# Allegro board PolarFire_SoC_Discovery_Kit_Rev2_PCB_091923.brd
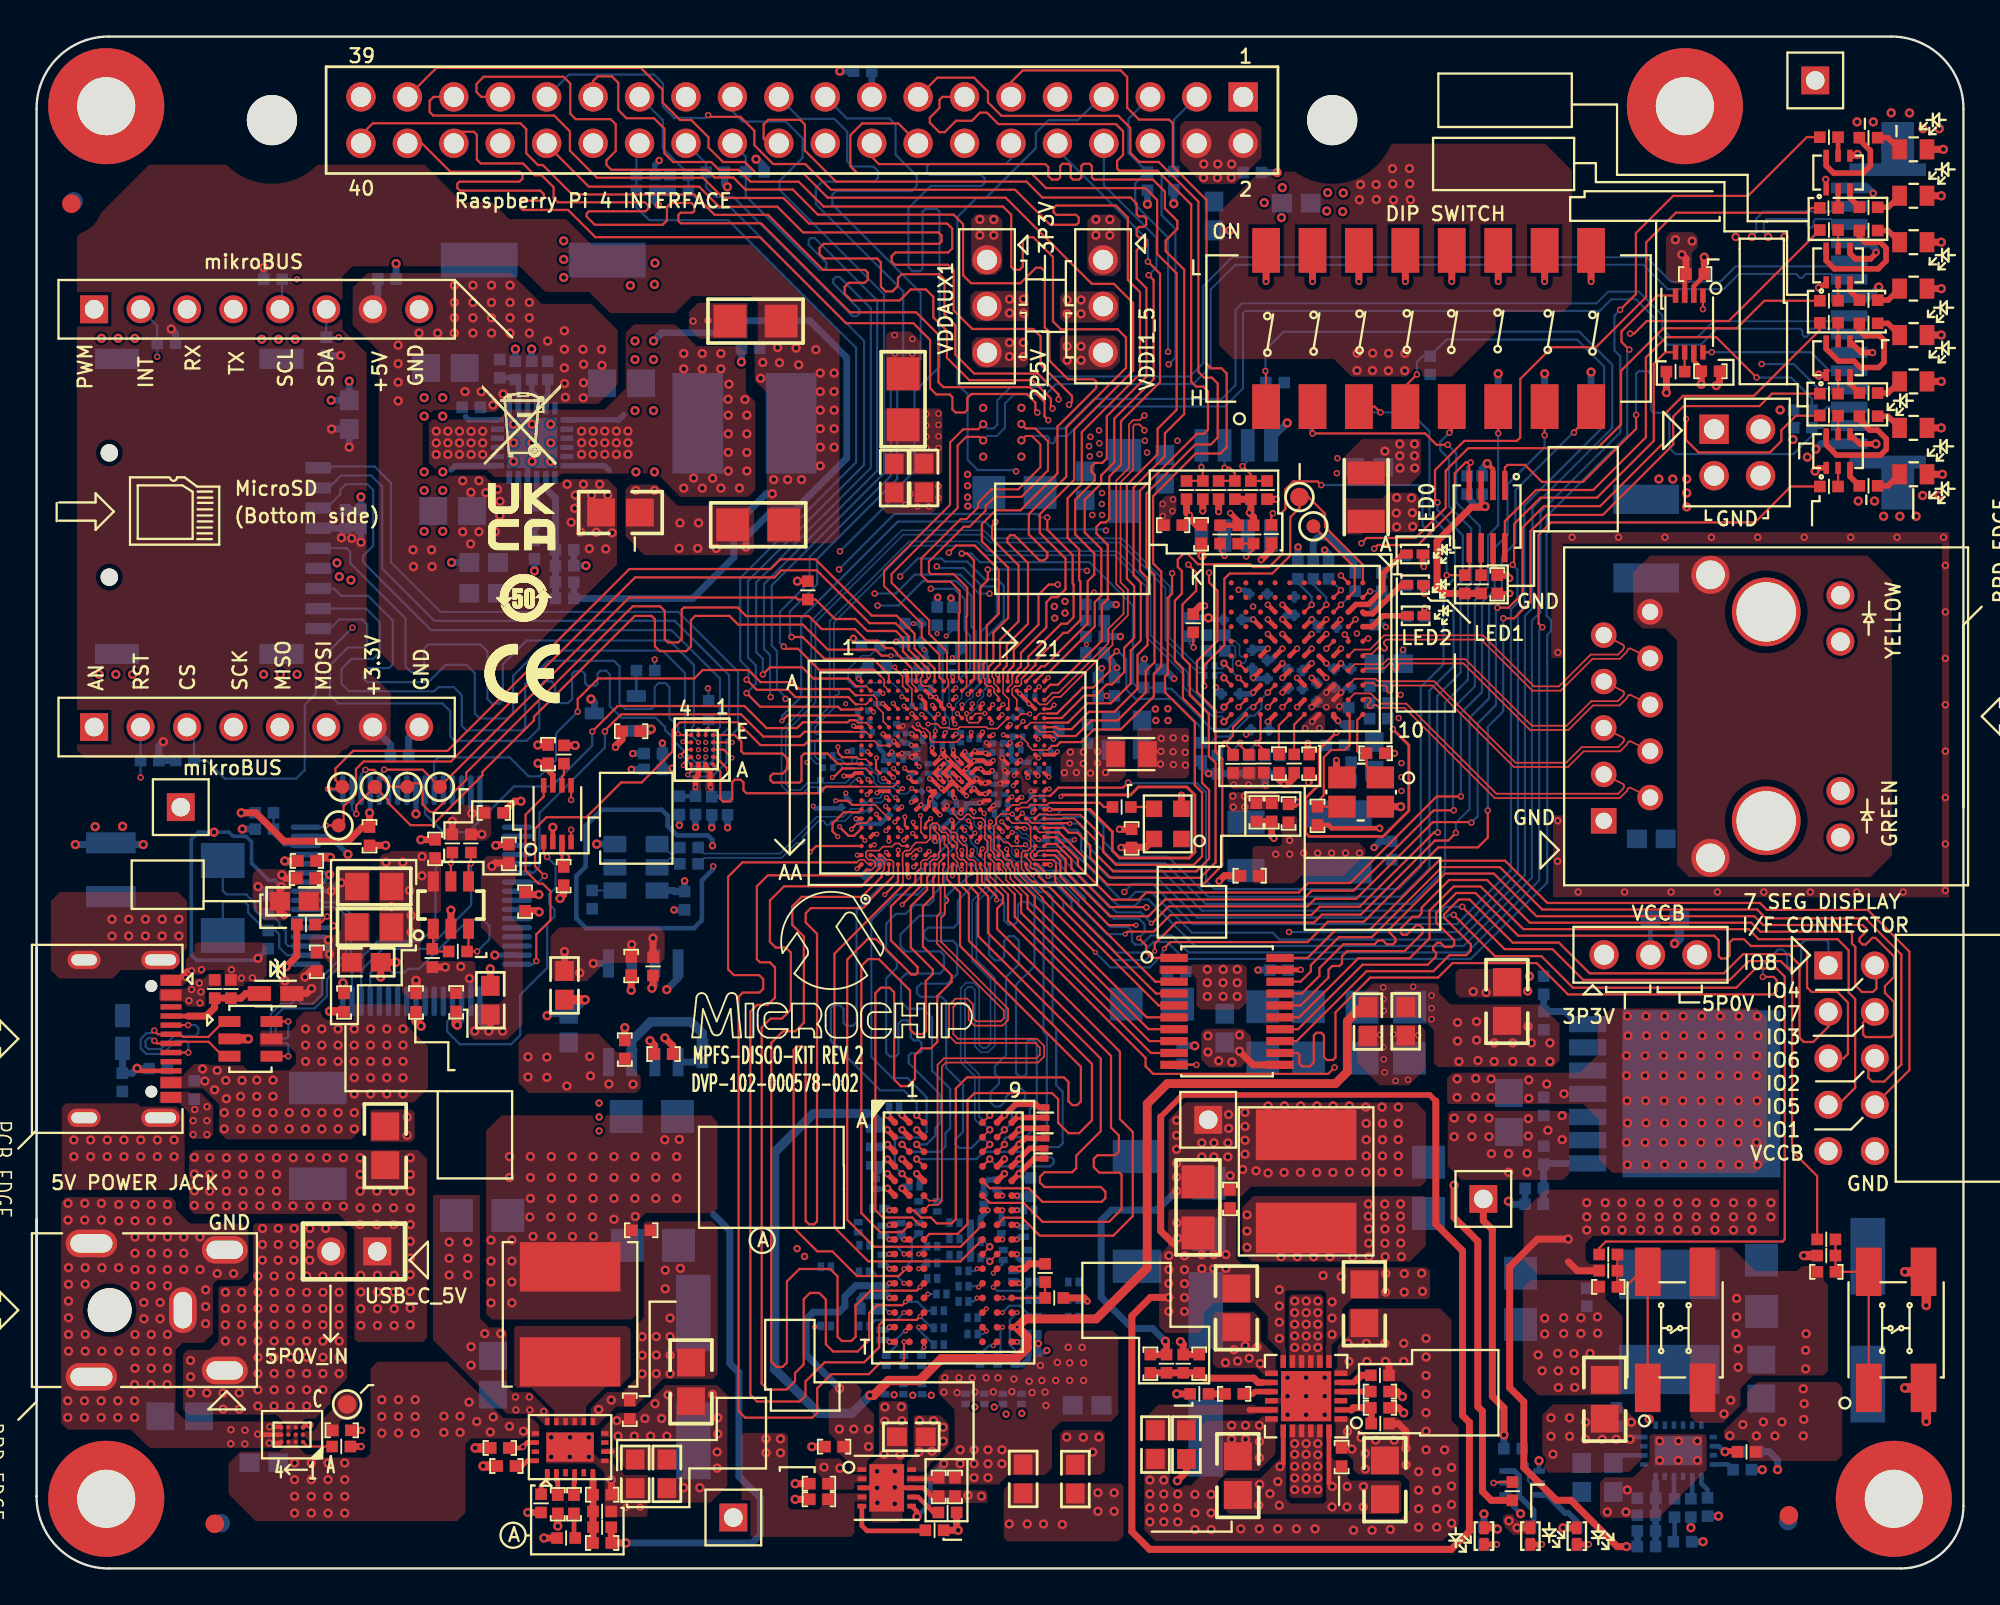
[diagram p0: board, top side]
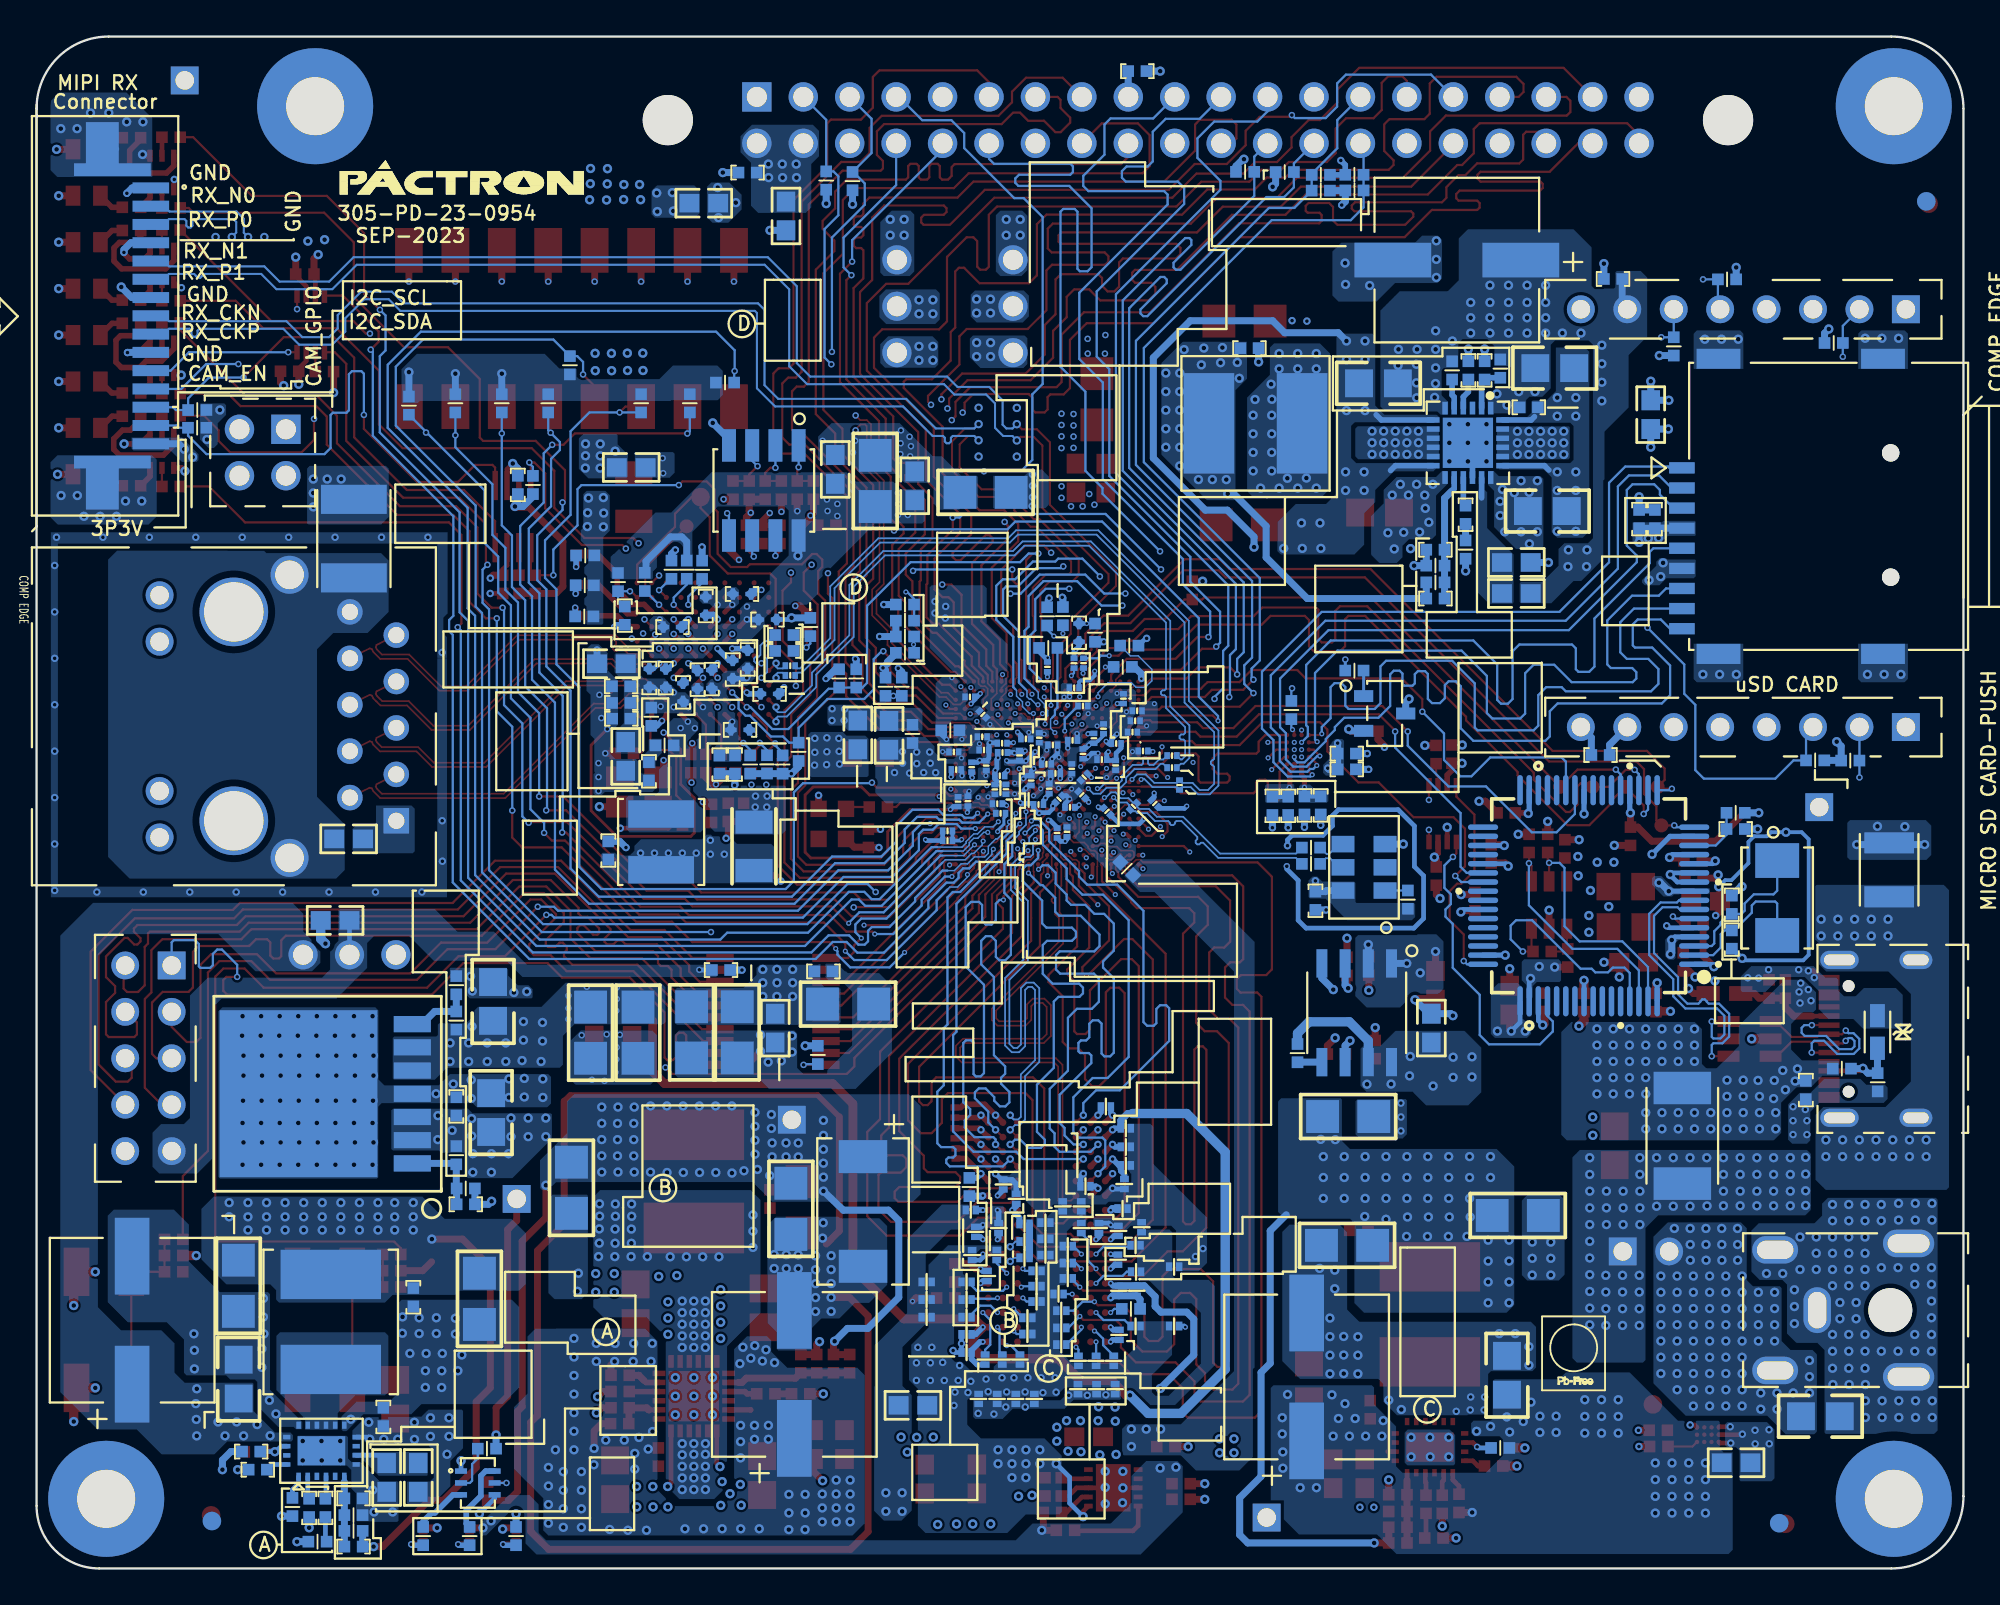
[diagram p1: board, bottom side, seen from below]

Outline 105.41 x 83.82 mm; copper layers: TOP, L02_GND1, L03_SIG1, L04_PWR, L05_GND2, BOTTOM. Coordinates in mm from the lower left corner of the outline.
Outline path: 0,79.88 arc(1.15,82.67) 3.94,83.82 101.47,83.82 arc(104.26,82.67) 105.41,79.88 105.41,3.43 arc(104.41,1) 101.98,0 3.94,0 arc(1.15,1.15) 0,3.94 0,79.88

## Design rules (mm)
net group CAMERA MODULE - SCL&SDA-1: nets CAM_I2C_SCL_B0 CAM_I2C_SDA_B0
net group CAMERA MODULE_SCL_SDA: nets CAM_I2C_SCL CAM_I2C_SDA
net group D3 TO J4(U16 TO D3): nets DM_FT4232H DP_FT4232H
net group DP&DM(D3 TO J4): nets DM_USBC DP_USBC
net group MIKROBUS - SCL&SDA: nets MBUS_I2CSCL MBUS_I2CSDA
net group RPI - SCL&SDA: nets RPI_GPIO2_SDA RPI_GPIO3_SCL
net group SCLKP/N: nets N17719658 N17719679
net group U1 TO J12: nets GPIO52NB1/LPRB_B GPIO52PB1/LPRB_A
net group U1 TO X1(REFCLK)-1: nets OSC_125MHZ_RFCLK_IN_N OSC_125MHZ_RFCLK_IN_P
net group U4 TO U5  -  SCL&SDA: nets VSC_EEP_SCLK VSC_EEP_SDAT
net group 7 SEGMENT DISPLAY DB(U1 TO U6): nets B0_SEG_DSP_IO1 B0_SEG_DSP_IO2 B0_SEG_DSP_IO3 B0_SEG_DSP_IO4 B0_SEG_DSP_IO5 B0_SEG_DSP_IO6 B0_SEG_DSP_IO7 B0_SEG_DSP_IO8
net group 7 SEGMENT DISPLAY DB(U6 TO J48): nets SEG_DSP_IO1 SEG_DSP_IO2 SEG_DSP_IO3 SEG_DSP_IO4 SEG_DSP_IO5 SEG_DSP_IO6 SEG_DSP_IO7 SEG_DSP_IO8
net group CLK_DATA: nets CLK CS DATA
net group DATA1: nets MSS_DDR4_DM0 MSS_DDR4_DQ0 MSS_DDR4_DQ1 MSS_DDR4_DQ2 MSS_DDR4_DQ3 MSS_DDR4_DQ4 MSS_DDR4_DQ5 MSS_DDR4_DQ6 MSS_DDR4_DQ7 MSS_DDR4_DQS_N0 MSS_DDR4_DQS_P0
net group DATA2: nets MSS_DDR4_DM1 MSS_DDR4_DQ8 MSS_DDR4_DQ9 MSS_DDR4_DQ10 MSS_DDR4_DQ11 MSS_DDR4_DQ12 MSS_DDR4_DQ13 MSS_DDR4_DQ14 MSS_DDR4_DQ15 MSS_DDR4_DQS_N1 MSS_DDR4_DQS_P1
net group EXTERNAL SPI FLASH: nets N17907305
net group JTAG(U1/RES TO U16): nets PF_JTAG_TCK PF_JTAG_TDI PF_JTAG_TDO PF_JTAG_TMS
net group MIKROBUS - SPI: nets MBUS_SPI_CLK MBUS_SPI_CS# MBUS_SPI_MISO MBUS_SPI_MOSI
net group POWER: nets EN_VTT N17891139 N17891244 N17891248 N17891304 N17891314 N17891462 N18024972 N18024974 N18024978 N18025016 N18025022 N18025105 N18025111 N18216548 N18216755 N18216781 N18216807 N18216811 N18216900 N18216912 N18219881 N18219893 N21999023 N21999055 N22171752 N22172011 N22172037 N22172059 N22172071 N22172213 PG_VTT
net group RPI 4 DATA&CLK: nets RPI_GPIO7 RPI_GPIO8_SPI_CE0_N RPI_GPIO9_SPI_MISO RPI_GPIO10_SPI_MOSI RPI_GPIO11_SPI_SCLK
net group RPI_GPIO: nets RPI_GPIO5 RPI_GPIO6 RPI_GPIO12 RPI_GPIO13 RPI_GPIO16 RPI_GPIO19 RPI_GPIO20 RPI_GPIO21 RPI_GPIO26
net group RPI_GPIO_GEN: nets RPI_GPIO17_GEN0 RPI_GPIO18_GEN1 RPI_GPIO22_GEN3 RPI_GPIO23_GEN4 RPI_GPIO24_GEN5 RPI_GPIO25_GEN6 RPI_GPIO27_GEN2
net group SDIO INTERFACE(U1 TO U85): nets SD_LT_CLK SD_LT_CMD SD_LT_DATA0 SD_LT_DATA1 SD_LT_DATA2 SD_LT_DATA3
net group SGMII INTERFACE (U4 TO J3): nets TXVNA TXVNB TXVNC TXVND TXVPA TXVPB TXVPC TXVPD
net group VSC1(U1 TO U4): nets VSC_MDC VSC_MDINTB VSC_MDIO
net group VSC(U4 TO J2): nets VSC_TCK VSC_TDI VSC_TDO VSC_TMS
nets with their own width: min track width 0.254; nets GND

## Placement (name value [footprint] x y rotation side)
C1  10uF/10V  [C0603]  57.47 8.92 180 bottom
C2  0.1uF/16V  [C0201]  47.42 9.81 90 bottom
C3  0.1uF/16V  [C0201]  53.87 9.28 90 bottom
C4  0.1uF/16V  [C0201]  50.22 17.14 180 bottom
C5  0.1uF/16V  [C0201]  56.72 14.71 180 bottom
C6  0.1uF/16V  [C0201]  56.72 13.75 180 bottom
C7  0.1uF/16V  [C0201]  52.86 9.28 90 bottom
C8  0.1uF/16V  [C0201]  51.84 9.28 90 bottom
C9  0.1uF/16V  [C0201]  50.83 9.28 90 bottom
C10  0.1uF/16V  [C0201]  46.41 9.81 90 bottom
C11  0.1uF/16V  [C0201]  48.26 19.81 270 bottom
C12  0.1uF/16V  [C0201]  50.22 18.92 180 bottom
C13  0.1uF/16V  [C0201]  43.18 13.26 0 bottom
C14  0.1uF/16V  [C0201]  56.72 15.68 180 bottom
C15  0.1uF/16V  [C0201]  49.28 19.81 270 bottom
C16  0.1uF/16V  [C0201]  43.18 16.51 0 bottom
C17  0.1uF/16V  [C0201]  44.96 18.67 270 bottom
C18  0.1uF/16V  [C0201]  50.22 18.03 180 bottom
C19  0.1uF/16V  [C0201]  48.44 9.81 90 bottom
C20  0.1uF/16V  [C0201]  54.23 17.14 90 bottom
C21  10uF/10V  [C0603]  53.97 4.9 90 top
C22  0.1uF/16V  [C0201]  51.36 18.85 180 bottom
C23  0.1uF/16V  [C0201]  45.24 15.19 270 bottom
C24  0.01uF/16V  [C0201]  46.2 15.19 270 bottom
C25  0.01uF/16V  [C0201]  53.39 16 90 bottom
C26  0.01uF/16V  [C0201]  45.82 23.07 0 bottom
C27  0.01uF/16V  [C0201]  45.9 21.04 90 bottom
C28  0.01uF/16V  [C0201]  46.18 12.78 90 bottom
C29  0.01uF/16V  [C0201]  54.31 19.61 180 bottom
C30  0.01uF/16V  [C0201]  54.05 18.42 270 bottom
C31  0.01uF/16V  [C0201]  48.03 20.91 180 bottom
C32  0.01uF/16V  [C0201]  46.23 18.47 270 bottom
C33  0.01uF/16V  [C0201]  52.53 21.01 270 bottom
C34  0.01uF/16V  [C0201]  55.17 23.81 90 top
C35  0.1uF/16V  [C0201]  46 19.69 0 bottom
C36  0.1uF/16V  [C0201]  45.82 22.05 0 bottom
C37  0.1uF/16V  [C0201]  52.78 18.62 270 bottom
C38  0.1uF/16V  [C0201]  46.91 25.27 180 bottom
C39  0.1uF/16V  [C0201]  55.17 24.95 270 top
C40  0.1uF/16V  [C0201]  47.29 18.62 270 bottom
C41  0.1uF/16V  [C0201]  55.12 22.71 90 top
C42  0.1uF/16V  [C0201]  46.25 16.9 270 bottom
C43  0.1uF/16V  [C0201]  51.82 20.22 270 bottom
C44  0.1uF/16V  [C0201]  54.53 11.82 180 bottom
C45  10uF/10V  [C0603]  61.72 60.14 90 bottom
C46  0.01uF/16V  [C0201]  45.82 24.08 0 bottom
C47  0.1uF/16V  [C0201]  54.53 12.81 180 bottom
C48  0.1uF/25V  [C0402]  28.83 37.88 270 top
C49  0.1uF/25V  [C0402]  27.98 44.56 270 top
C50  1uF/16V  [C0402]  16.7 7.56 0 top
C51  2.2uF/16V  [C0603]  12.44 5.78 180 bottom
C52  1uF/16V  [C0402]  8.62 26.18 90 bottom
C60  0.1uF/16V/10%/X7R  [C0402]  67.97 44.04 90 top
C61  1uF/16V_NL  [C0402]  73.23 52.13 270 bottom
C62  0.01uF/16V  [C0402]  64.51 50.2 180 bottom
C63  0.1uF/25V  [C0402]  63.71 56.59 90 top
C64  0.1uF/25V  [C0402]  59.91 39.95 90 top
C65  33pF/25V  [C0402]  70.07 41.18 270 top
C66  33pF/25V  [C0402]  73.25 44.6 0 top
C67  0.01uF/16V  [C0201_HS]  43.3 43.81 0 bottom
C68  0.01uF/16V  [C0201_HS]  43.3 44.48 0 bottom
C69  0.01uF/16V  [C0201_HS]  64.18 48.86 180 bottom
C70  0.01uF/16V  [C0201_HS]  64.18 49.39 180 bottom
C74  0.1uF/50V  [C0603]  88.34 39.92 0 bottom
C76  1000pF/3KV  [C1812]  88.05 56.35 90 bottom
C77  10uF/6.3V  [C0402]  74.13 39.28 90 bottom
C78  10uF/10V  [C0603]  73.18 44.43 270 bottom
C79  1uF/16V  [C0402]  73.42 46.49 0 bottom
C80  0.01uF/16V  [C0402]  64.51 51.07 180 bottom
C81  1000pF/50V  [C0402]  71.91 43.62 90 bottom
C82  0.1uF/25V  [BGA0402]  70.62 51.51 180 bottom
C83  0.1uF/25V  [BGA0402]  66.51 49.74 270 bottom
C84  0.1uF/25V  [BGA0402]  68.8 52.66 90 bottom
C85  10uF/6.3V  [C0402]  69.62 44.04 270 top
C86  10uF/6.3V  [C0402]  67.2 43.99 270 bottom
C87  10uF/10V  [C0603]  72.88 60.24 180 bottom
C88  0.1uF/25V  [BGA0402]  65.43 51.92 180 bottom
C89  0.1uF/25V  [BGA0402]  66.82 53.32 0 bottom
C90  1uF/16V  [C0402]  68.05 43.99 270 bottom
C91  1uF/16V_NL  [C0402]  68.49 41.31 90 top
C92  1uF/16V  [C0402]  62.18 57.08 0 top
C93  0.1uF/25V  [BGA0402]  67.32 49.19 270 bottom
C94  0.1uF/25V  [BGA0402]  70.05 47.94 90 bottom
C95  0.1uF/25V  [BGA0402]  68.47 48.66 270 bottom
C96  0.1uF/25V  [BGA0402]  66.92 45.89 0 bottom
C97  0.1uF/25V  [BGA0402]  70.99 48.72 90 bottom
C98  0.1uF/25V  [BGA0402]  71.89 48.72 90 bottom
C99  0.1uF/25V  [BGA0402]  69.25 48.63 270 bottom
C100  0.1uF/25V  [C0402]  73.43 48.27 0 bottom
C101  10uF/10V  [C0603]  73.96 49.5 0 bottom
C102  10uF/6.3V  [C0402]  66.73 41.37 270 top
C103  1uF/16V  [C0402]  73.42 47.36 0 bottom
C104  0.1uF/25V  [BGA0402]  65.31 47.85 180 bottom
C105  1uF/16V  [C0402]  67.57 41.37 270 top
C106  1uF/16V  [C0402]  66.36 37.9 180 top
C107  0.1uF/25V  [C0402]  35.45 36.53 270 bottom
C108  4.7nF/25V  [BGA0201]  50.01 42.66 270 bottom
C109  4.7nF/25V  [BGA0201]  50.16 44.01 0 bottom
C110  4.7nF/25V  [BGA0201]  51 43.11 270 bottom
C111  1000pF/16V  [BGA0201]  55.1 43.71 0 bottom
C112  4.7nF/25V  [BGA0201]  49.67 43.5 180 bottom
C113  1000pF/16V  [BGA0201]  53.46 43.93 90 bottom
C114  0.1uF/16V  [BGA0201]  51.29 45.39 0 bottom
C115  0.1uF/16V  [BGA0201]  50.6 41.8 180 bottom
C116  0.1uF/16V  [BGA0201]  47.04 45.94 270 bottom
C117  0.1uF/16V  [BGA0201]  50.56 45.45 270 bottom
C118  0.1uF/16V  [BGA0201]  49.48 42.1 135 bottom
C119  0.1uF/16V  [BGA0201]  48.73 45.31 0 bottom
C120  0.01uF/16V  [BGA0201]  51.64 44.48 90 bottom
C121  0.1uF/16V  [BGA0201]  55.23 44.68 0 bottom
C122  0.1uF/16V  [BGA0201]  54.46 41.98 270 bottom
C123  10uF/10V  [C0603]  48.55 59.67 270 top
C124  0.1uF/16V_NL  [BGA0201]  53.64 46.73 45 bottom
C125  0.1uF/16V_NL  [BGA0201]  48.23 42.33 45 bottom
C126  0.1uF/16V  [BGA0201]  44.24 41.85 225 bottom
C127  0.1uF/16V  [BGA0201]  49.04 40.3 90 bottom
C128  0.1uF/16V  [BGA0201]  48.78 43.75 90 bottom
C129  0.1uF/16V_NL  [BGA0201]  55 41.96 270 bottom
C130  0.1uF/16V_NL  [BGA0201]  49.82 45.06 0 bottom
C131  47uF/10V  [C1206]  53.5 58.88 180 bottom
C133  47uF/6.3V  [C1206]  69.58 29.33 90 bottom
C134  10uF/10V  [C0603]  58.78 45.59 270 bottom
C135  47uF/6.3V  [C1206]  67.08 29.33 90 bottom
C137  0.1uF/16V  [BGA0201]  48.65 48.19 180 bottom
C139  0.1uF/16V  [BGA0201]  50.11 49.33 90 bottom
C140  10uF/10V  [C0603]  60.48 45.61 270 bottom
C141  0.1uF/16V  [BGA0201]  52.99 42.62 270 bottom
C142  0.1uF/16V  [BGA0201]  52.59 45.15 0 bottom
C143  0.1uF/16V_NL  [BGA0201]  54.35 47.69 0 bottom
C144  47uF/6.3V  [C1206]  63.54 19.76 90 top
C145  0.1uF/16V  [BGA0201]  48.88 41.65 0 bottom
C147  0.1uF/16V  [BGA0201]  52.85 41.84 0 bottom
C148  1000pF/16V  [BGA0201]  52.72 43.37 180 bottom
C150  0.1uF/16V  [BGA0201]  47.57 45.42 270 bottom
C152  330uF/6.3V  [TAN_D_TPSD]  60.2 19.53 270 bottom
C153  10uF/10V  [C0603]  72.83 29.92 90 top
C154  0.1uF/16V  [BGA0201]  54.25 43.84 90 bottom
C155  47uF/6.3V  [C1206]  75.1 29.31 90 bottom
C156  47uF/10V  [C1206]  59.53 59.5 270 bottom
C157  0.1uF/16V  [BGA0201]  52.38 42.63 270 bottom
C158  0.1uF/16V  [BGA0201]  52.57 44.65 180 bottom
C159  10uF/10V  [C0603]  74.9 29.94 90 top
C160  470uF/16V  [CAP_AL_D_8P3MM_DUAL_FP_16SEV_865]  63.96 10.62 90 bottom
C161  47uF/10V  [C1206]  64.14 19.67 270 bottom
C162  47uF/10V  [C1206]  76.15 20.83 270 bottom
C165  22uF/16V  [C0805]  73.76 4.85 270 top
C166  22uF/16V  [C0805]  72.64 14.48 90 top
C168  0.1uF/25V  [C0402]  71.39 6.1 270 top
C169  0.1uF/25V  [C0402]  65.29 20.22 270 top
C170  10uF/16V  [C0805]  80.54 24.94 90 bottom
C171  0.1uF/25V  [C0402]  82.45 25.28 90 bottom
C172  470uF/16V  [CAP_AL_D_8P3MM_DUAL_FP_16SEV_865]  35.93 10.48 90 bottom
C173  22uF/16V  [C0805]  24.97 10.57 90 bottom
C174  100pF/50V  [C0402]  63.6 11.2 90 top
C175  10uF/16V  [C0805]  7.83 8.33 0 bottom
C176  0.1uF/25V  [C0402]  32.53 45.81 180 top
C177  2.2uF/16V  [C0603]  62.9 6.78 270 top
C178  1000pF/50V  [C0402]  73.49 8.79 180 top
C179  39pF/50V  [C0402]  65.51 9.55 180 top
C180  470pF/50V  [C0402]  73.49 9.68 0 top
C182  0.1uF/16V_NL  [BGA0201]  49.58 40.24 270 bottom
C183  2.2uF/16V  [C0603]  86.26 4.98 270 bottom
C185  1000pF/50V  [C0402]  88.07 1.2 180 bottom
C186  100pF/50V  [C0402]  88.07 3.84 180 bottom
C187  1uF/16V  [C0402]  42.8 4.64 180 top
C189  1000pF/50V  [C0402]  93.67 6.39 180 bottom
C190  39pF/50V  [C0402]  89.61 3.31 270 bottom
C193  470pF/50V  [C0402]  93.31 5.4 0 bottom
C194  390pF/50V  [C0402]  90.5 3.31 270 bottom
C199  47uF/6.3V  [C1206]  33.66 24.73 0 bottom
C200  1uF/4V  [BGA0201]  46.85 41.42 225 bottom
C201  0.1uF/16V  [BGA0201]  46.38 43.94 90 bottom
C202  0.1uF/16V  [BGA0201]  44.88 44.73 180 bottom
C203  10uF/10V  [C0603]  65 29.56 90 bottom
C204  0.1uF/16V  [BGA0201]  48.17 44.57 90 bottom
C206  0.1uF/16V  [BGA0201]  47.13 44.26 180 bottom
C208  0.1uF/25V  [C0402]  81.93 19.92 180 bottom
C209  47uF/6.3V  [C1206]  72.51 29.31 90 bottom
C211  10uF/10V  [C0603]  56.83 4.89 90 top
C212  0.1uF/16V  [BGA0201]  45.2 46.93 180 bottom
C213  0.1uF/16V  [BGA0201]  46.35 45.14 180 bottom
C214  10uF/10V  [C0603]  46.92 59.66 270 top
C215  0.1uF/16V  [BGA0201]  45.31 46.38 180 bottom
C216  0.1uF/25V  [C0402]  19.85 44.51 0 bottom
C217  0.1uF/16V  [BGA0201]  45.46 45.76 180 bottom
C218  47uF/10V  [C1206]  47.4 63.97 90 top
C219  10uF/16V  [C0805]  80.44 31.02 90 bottom
C220  0.1uF/16V  [BGA0201]  48.1 43.3 315 bottom
C221  0.1uF/25V  [C0402]  19.17 70.56 0 bottom
C222  0.1uF/25V  [C0402]  97.91 16.23 180 top
C223  0.1uF/25V  [C0402]  85.98 15.41 180 top
C224  0.1uF/25V  [C0402]  84.8 14.84 270 bottom
C225  0.1uF/25V  [C0402]  66.51 76.38 0 bottom
C226  47uF/10V  [C1206]  81.18 14.75 270 bottom
C227  47uF/10V  [C1206]  94.37 15.47 270 bottom
C229  0.1uF/25V  [C0402]  45.19 81.93 180 bottom
C231  10uF/10V  [C0603]  64.41 74 270 bottom
C232  10uF/10V  [C0603]  68.91 74.7 0 bottom
C234  0.1uF/25V  [C0402]  21.8 39.37 90 top
C235  4.7uF/6.3V  [C0402]  42.8 3.78 0 top
C237  10uF/10V  [C0603]  47.85 7.2 180 top
C238  10uF/6.3V  [C0402]  50.24 4.46 270 top
C239  10uF/6.3V  [C0402]  49.35 4.46 270 top
C240  22uF/16V  [C0805]  35.8 10.21 90 top
C241  470uF/16V  [CAP_AL_D_8P3MM_DUAL_FP_16SEV_865]  100.18 13.58 90 bottom
C242  22uF/16V  [C0805]  85.79 9.26 90 top
C243  22uF/16V  [C0805]  94.36 10.36 90 bottom
C246  0.1uF/25V  [C0402]  32.45 8.68 90 top
C247  2.2uF/16V  [C0603]  32.75 5.18 270 top
C248  1000pF/50V  [C0402]  25.34 6.59 0 top
C249  1000pF/50V  [C0402]  30.94 1.4 0 top
C250  1uF/16V  [C0402]  43.63 6.66 0 top
C251  100pF/50V  [C0402]  30.94 4.03 0 top
C252  39pF/50V  [C0402]  29.4 3.51 270 top
C253  470pF/50V  [C0402]  25.7 5.6 180 top
C254  390pF/50V  [C0402]  28.51 3.51 270 top
C255  0.1uF/25V  [C0402]  33.07 18.5 0 top
C256  47uF/10V  [C1206]  24.38 19.31 180 bottom
C257  10uF/16V  [C0805]  19.08 23.13 90 top
C260  0.1uF/25V  [C0402]  32.53 32.96 270 top
C261  4.7uF/16V  [C0603]  28.88 31.9 270 top
C262  4.7uF/16V  [C0603]  14.1 36.5 180 top
C263  4.7uF/16V  [C0603]  18.04 33.17 0 top
C264  0.1uF/25V  [C0402]  14.74 37.77 180 top
C265  0.1uF/25V  [C0402]  15.33 33.2 270 top
C267  0.1uF/25V  [C0402]  14.79 38.71 0 top
C268  0.1uF/25V  [C0402]  16.82 30.97 270 top
C269  0.1uF/25V  [C0402]  25.83 39.1 90 top
C270  0.1uF/25V  [C0402]  25.01 41.34 0 top
C271  0.1uF/25V  [C0402]  18.21 40.06 270 top
C272  0.1uF/25V  [C0402]  20.76 30.97 270 top
C273  0.1uF/25V  [C0402]  26.72 36.49 90 top
C275  0.1uF/25V  [C0402]  32.18 28.39 90 top
C277  10uF/10V  [C0603]  29.11 29.57 270 bottom
C278  1000pF/50V  [C0402]  34.3 28.15 180 top
C279  1uF/16V  [C0402]  12.46 40.46 180 bottom
C280  4.7uF/16V  [C0603]  24.82 31.09 90 top
C281  0.01uF/50V  [C0402]  60.93 11.2 270 top
C282  0.1uF/25V  [C0402]  22.95 30.98 270 top
C283  10uF/16V  [C0805]  80.44 31.02 90 top
C284  47uF/10V  [C1206]  33.72 17.68 0 bottom
C285  27pF/50V  [C0402]  12.67 34.41 90 bottom
C286  10uF/10V  [C0603]  57.37 59.24 270 bottom
C288  0.1uF/25V  [C0402]  86.44 8.29 90 bottom
C296  27pF/50V  [C0402]  12.67 36.32 270 bottom
C297  2200pf/2KV  [C1210]  4.06 38.23 90 bottom
C300  1uF/16V  [BGA0402]  48.38 51.2 90 bottom
C507  0.1uF/16V  [C0402]  62.37 32.67 180 bottom
C515  0.1uF/16V  [C0402]  67.97 32.74 0 bottom
C677  0.1uF/16V  [BGA0201]  53.68 45.51 0 bottom
C678  0.1uF/16V  [BGA0201]  53.58 44.79 0 bottom
C679  0.1uF/16V  [BGA0201]  55.58 40.35 0 bottom
C680  0.1uF/16V  [BGA0201]  55.58 39.83 0 bottom
C681  47uF/6.3V  [C1206]  61.02 30.88 0 bottom
C722  0.1uF/25V  [C0402]  16.88 57.42 90 bottom
C723  0.1uF/25V  [C0402]  17.74 57.42 90 bottom
C724  4.7uF/16V  [C0603]  17.11 63.13 90 bottom
C1090  0.01uF/50V  [C0402]  28.89 53.07 180 bottom
C1095  0.1uF/16V_NL  [BGA0201]  52.67 41.32 0 bottom
C1097  0.1uF/16V_NL  [BGA0201]  45.95 47.59 270 bottom
C1099  470uF/16V  [CAP_AL_D_8P3MM_DUAL_FP_16SEV_865]  27.71 71.59 0 bottom
C1100  22uF/16V  [C0805]  31.94 57.78 0 top
C1101  22uF/16V  [C0805]  22.76 57.86 180 bottom
C1103  0.1uF/25V  [C0402]  23.78 63.53 180 bottom
C1104  22uF/16V  [C0805]  32 64.85 0 bottom
C1105  22uF/16V  [C0805]  22.36 65.68 180 bottom
C1106  2.2uF/16V  [C0603]  24.46 55.04 180 bottom
C1107  1000pF/50V  [C0402]  26.19 65.55 270 bottom
C1108  39pF/50V  [C0402]  27.24 57.65 270 bottom
C1109  470pF/50V  [C0402]  27.08 65.55 90 bottom
C1112  100pF/50V  [C0402]  28.89 55.74 0 bottom
C1113  0.1uF/25V  [C0402]  39.06 66.77 180 bottom
C1114  47uF/10V  [C1206]  39.48 57.1 180 top
C1115  47uF/10V  [C1206]  39.33 68.25 180 top
C1117  0.1uF/25V  [C0402]  79.08 59.29 270 bottom
C1118  0.1uF/25V  [C0402]  79.91 53.85 270 top
C1119  0.1uF/25V  [C0402]  90.73 70.82 180 top
C1120  0.1uF/25V  [C0402]  91.57 65.51 0 top
C1123  NL  [C0402]  33.73 44.59 0 bottom
C1124  NL  [C0402]  37.8 41.73 270 bottom
C1126  2.2uF/10V  [C0402]  33.73 43.72 0 bottom
C1127  0.1uF/25V  [C0402]  36.05 41.75 270 bottom
C1128  NL  [C0402]  35.16 41.75 270 bottom
C1129  0.1uF/25V  [C0402]  36.94 41.73 270 bottom
C1130  22uF/16V  [C0805]  65.72 5.08 270 top
C1131  22uF/16V  [C0805]  65.64 14.26 90 top
C1132  10uF/10V  [C0603]  89.08 35.46 0 bottom
CLKOUT_125MHZ  -  [TP_SMD_C_40MIL]  69.09 58.62 0 top
D1  PGB1010603MR_NL  [PGB1010603MR]  13.08 31.46 90 top
D2  PGB1010603MR_NL  [PGB1010603MR]  4.7 29.35 0 bottom
D3  USBLC6-2SC6  [SOT23-6_DUAL_FP_USBLC6_SRL05]  11.7 28.98 0 top
F2  3A/1812  [SM_R_1812_1812L300]  15.38 23.67 90 bottom
FB2  120ohm/20mOhm/3.5A  [L1206]  72.74 58.62 90 top
FB3  120ohm/20mOhm/3.5A  [L1206]  66.16 39.51 90 bottom
GND1  HDR1X1  [HDR_1X1_613]  38.12 2.79 0 top
GND4  HDR1X1  [HDR_1X1_613]  7.89 41.66 0 top
GND5  HDR1X1  [HDR_1X1_613]  97.3 81.42 0 top
J3  SI-61001-F  [BEL_RJ45_MAG_SI-61001-F]  105.41 46.62 90 top
J4  USB4105-GF-A-120  [USB_C_RCP_DUAL_FP_USB4105_629722]  0 28.98 270 top
J5  PPTC081LFBN-RC  [RCP_1X8_100MIL_DUAL_FP_PPTC08_61300]  12.04 46.04 0 top
J6  PPTC081LFBN-RC  [RCP_1X8_100MIL_DUAL_FP_PPTC08_61300]  12.04 68.9 0 top
J7  -  [PJK_5A_PJ-047AH]  0 14.13 180 top
J10  HDR/20X2/100MIL  [HDR_20X2_100MIL_61304]  41.88 79.25 0 top
J11  FPC_15x1_1P0MM_RA  [CONN_FPC_15POS_1MM_TRIP_FP_686115183_1489]  105.41 68.54 270 bottom
J12  HDR/2X2/100MIL_NL  [HDR_2X2_100MIL_61300]  93.04 61.06 270 top
J17  MEM2075-00-140-01-A  [USD_CONN_MEM2075]  0 58.12 90 bottom
J45  HDR/1X3/100MIL  [HDR_3X1_100MIL_613]  58.34 69.06 0 top
J46  HDR/1X3/100MIL  [HDR_3X1_100MIL_613]  51.99 69.06 0 top
J47  HDR_1X2_100MIL  [HDR_1X2_100MIL_TSW]  18.64 17.35 180 top
J48  HDR_5X2_RA_100MIL  [HDR_5X2_RA_100MIL_DUAL_FP_PH2_613]  111.1 27.91 90 top
J49  HDR/1X3/100MIL  [HDR_3X1_100MIL_613]  88.29 33.58 90 top
JT_TCK  TP_SMD_C_40MIL  [TP_SMD_C_30MIL]  16.52 40.66 0 top
JT_TDI  TP_SMD_C_40MIL  [TP_SMD_C_30MIL]  16.73 42.77 0 top
JT_TDO  TP_SMD_C_40MIL  [TP_SMD_C_30MIL]  18.5 42.77 90 top
JT_TMS  TP_SMD_C_40MIL  [TP_SMD_C_30MIL]  20.28 42.77 90 top
JT_TRST#  TP_SMD_C_40MIL  [TP_SMD_C_30MIL]  22.06 42.77 90 top
L1  4.7uH/1.7A/84mOhm  [IND_4X4MM_DUAL_FP_ASPI_7440]  71.24 39.75 90 bottom
L3  1uH/13A/7.81mOhm  [IND_TRIP_FP_SPM6530_FP3_744939]  89.32 13.49 180 bottom
L5  1uH/13A/7.81mOhm  [IND_TRIP_FP_SPM6530_FP3_744939]  29.19 13.9 0 top
L6  HZ0805E601R-10  [L0805]  18.47 37.31 180 top
L8  HZ0805E601R-10  [L0805]  18.47 35.1 180 top
L9  1uH/13A/7.81mOhm  [IND_TRIP_FP_HCP0704_SPM6530_744939]  38.73 62.65 0 bottom
L10  1uH/13A/7.81mOhm  [IND_TRIP_FP_HCP0704_SPM6530_744939]  69.45 21.18 90 top
LD1  GRN/2.1V/20mA  [LED_0402]  75.39 55.5 0 top
LD2  GRN/2.1V/20mA  [LED_0402]  75.42 53.83 0 top
LD3  GRN/2.1V/20mA  [LED_0402]  75.44 52.13 0 top
LED1  YEL/2.1V/20mA  [LED_0603]  102.67 77.65 180 top
LED2  RED/2V/20mA  [LED_0603]  102.67 75.11 180 top
LED3  YEL/2.1V/20mA  [LED_0603]  102.67 72.57 180 top
LED4  RED/2V/20mA  [LED_0603]  102.67 70.03 180 top
LED5  YEL/2.1V/20mA  [LED_0603]  102.67 67.49 180 top
LED6  RED/2V/20mA  [LED_0603]  102.67 64.95 180 top
LED7  YEL/2.1V/20mA  [LED_0603]  102.67 62.41 180 top
LED8  RED/2V/20mA  [LED_0603]  102.67 59.87 180 top
NOREF  -  []  101.6 3.81 0 top
NOREF#2  -  [unnamed#2]  1.9 74.68 270 top
NOREF#3  -  [unnamed#2]  9.75 2.44 270 top
NOREF#4  -  []  0 3.96 90 top
NOREF#5  -  []  1.02 1.3 0 top
NOREF#6  -  []  101.98 0 90 top
NOREF#7  -  [unnamed#3]  3.81 3.81 0 top
NOREF#8  -  [unnamed#2]  101.6 3.81 0 top
NOREF#9  -  [unnamed#2]  95.86 2.91 270 top
NOREF#10  -  [unnamed#2]  90.17 80.01 0 top
NOREF#11  -  []  90.17 80.01 90 top
NOREF#12  -  []  0.01 4.06 0 top
NOREF#13  -  []  3.81 80.01 90 top
NOREF#14  -  []  3.94 83.82 0 top
NOREF#15  -  [unnamed#3]  3.81 80.01 0 top
NOREF#16  -  []  90.17 80.01 0 top
NOREF#17  -  [unnamed#2]  95.82 2.59 90 bottom
NOREF#18  -  [unnamed#2]  10.08 2.48 90 bottom
NOREF#19  -  [unnamed#2]  2.03 74.8 90 bottom
R1  39R/5%  [R0201]  49.35 13.16 180 bottom
R2  39R/5%  [R0201]  51.21 13.72 0 bottom
R3  39R/5%  [R0201]  49.35 12.25 180 bottom
R4  39R/5%  [R0201]  50.71 14.61 0 bottom
R5  39R/5%  [R0201]  49.5 15.02 180 bottom
R6  39R/5%  [R0201]  54.53 13.75 180 bottom
R7  39R/5%  [R0201]  45.29 13.26 0 bottom
R8  39R/5%  [R0201]  52.58 11.43 90 bottom
R9  39R/5%  [R0201]  46.48 11.36 90 bottom
R10  39R/5%  [R0201]  51.21 12.83 0 bottom
R11  39R/5%  [R0201]  49 15.87 180 bottom
R12  39R/5%  [R0201]  47.45 11.36 90 bottom
R13  39R/5%  [R0201]  50.71 15.44 0 bottom
R14  39R/5%  [R0201]  51.61 11.43 90 bottom
R15  39R/5%  [R0201]  48.26 18.62 270 bottom
R16  39R/5%  [R0201]  54.53 15.68 180 bottom
R17  4.7K_NL  [R0402]  65.73 56.58 90 top
R18  39R/5%  [R0201]  49 16.71 180 bottom
R19  39R/5%  [R0201]  48.41 11.36 90 bottom
R20  39R/5%  [R0201]  49.35 14.1 180 bottom
R21  39R/5%  [R0201]  54.53 14.71 180 bottom
R22  39R/5%  [R0201]  45.26 16.24 0 bottom
R23  39R/5%  [R0201]  49 17.63 180 bottom
R24  39R/5%  [R0201]  45.29 17.68 0 bottom
R25  39R/5%  [R0201]  50.71 16.28 0 bottom
R26  240R/1%  [R0402]  54.38 20.87 270 bottom
R27  4.7K  [R0201]  53.52 11.43 270 bottom
R28  10K  [R0402]  45.54 14.2 180 bottom
R29  39R/5%  [R0201]  51.36 17.89 0 bottom
R30  39R/5%  [R0201]  51.36 17 0 bottom
R31  10K  [R0402]  69.84 54.65 270 bottom
R32  4.7K  [R0402]  28.85 44.53 90 top
R33  10K  [R0402]  16.67 6.67 0 top
R34  10K_NL  [R0402]  55.17 16.17 270 top
R35  10K  [R0402]  55.67 14.8 0 top
R42  4.7K  [R0402]  61.5 48.7 270 bottom
R43  4.7K  [R0402]  65.45 43.99 90 bottom
R44  4.7K  [R0402]  64.59 43.99 90 bottom
R45  10K  [R0402]  63.72 44.68 90 bottom
R46  0R_NL  [R0402]  60.57 48.7 90 bottom
R47  0R_NL  [R0402]  66.31 44.03 270 top
R48  0R_NL  [R0402]  65.45 44.03 270 top
R49  2K/1/16W/1%  [R0402]  68.8 44.04 270 top
R50  10K  [R0402]  73.6 53.97 270 bottom
R51  10K  [R0402]  70.68 54.65 90 bottom
R54  5.9K/1%  [R0402]  63.27 51.72 270 top
R55  4.02K/1%  [R0402]  57.9 50.99 180 bottom
R56  22.6K/1%  [R0402]  58.08 48.24 270 bottom
R58  0R_NL  [R0402]  63.08 51.51 90 bottom
R59  0R_NL  [R0402]  57.9 50.1 0 bottom
R60  0R_NL  [R0402]  58.97 48.24 90 bottom
R61  0R_NL  [R0402]  57.9 52.74 0 bottom
R62  0R  [R0402]  59.36 41.66 180 top
R63  4.7K_NL  [R0402]  66.58 56.58 270 top
R64  4.7K  [R0402]  67.55 56.6 90 top
R65  4.7K_NL  [R0402]  66.43 59 90 top
R66  4.7K_NL  [R0402]  65.55 59.01 90 top
R67  4.7K_NL  [R0402]  63.8 59.01 90 top
R68  4.7K  [R0402]  64.74 56.58 90 top
R69  4.7K  [R0402]  67.32 59 270 top
R70  4.7K  [R0402]  64.66 59.01 270 top
R71  4.7K_NL  [R0402]  62.91 59.01 270 top
R73  1K  [R0402]  75.42 53.79 0 bottom
R78  1K  [R0402]  75.45 52.09 0 bottom
R79  1.5K  [R0402]  71.78 46.6 270 bottom
R80  15R/1%  [R0402]  71.05 45.04 0 bottom
R81  10K  [R0402]  55.42 45.86 0 bottom
R82  100R_NL  [BGA0201]  42.88 42.87 270 bottom
R83  100R_NL  [BGA0201]  45.4 41.7 315 bottom
R84  1K  [R0402]  30.39 36.6 270 bottom
R85  0R  [R0402]  35.69 39.44 0 bottom
R86  0R  [R0402]  35.69 38.55 0 bottom
R88  1.1K/1%  [R0402]  61.82 11.2 90 top
R90  10K_NL  [R0402]  25.34 6.59 180 bottom
R91  20K  [R0402]  82.45 22.61 270 bottom
R92  2.55K/1%  [R0402]  62.73 11.2 270 top
R93  20K  [R0402]  81.93 20.79 180 bottom
R94  47.5K  [R0402]  73.49 10.57 0 top
R95  10K/1%  [R0402]  82.45 29.98 270 bottom
R96  2.2R/1%/0.1W  [R0603]  61.21 6.78 270 top
R97  2.49K/1%  [R0402]  82.45 31.91 270 bottom
R98  20K/1%  [R0402]  63.61 9.55 0 top
R100  10K  [R0402]  49.83 3.06 0 top
R101  698R/1%  [R0402]  88.07 2.92 0 bottom
R104  10K_NL  [R0402]  93.54 6.38 0 top
R105  47.5K  [R0402]  91.41 3.36 270 bottom
R106  2.2R/1%/0.1W  [R0603]  84.53 4.98 270 bottom
R107  10K_NL  [R0402]  96.62 62.42 180 bottom
R108  10K  [R0402]  66.37 43.99 90 bottom
R109  10K_NL  [R0402]  96.62 63.38 180 bottom
R111  20K/1%  [R0402]  90.04 1.46 180 bottom
R112  10K  [R0402]  49.26 52.11 270 bottom
R113  1K  [R0402]  49.12 2.09 180 top
R115  1.1K/1%  [R0402]  30.94 2.26 0 top
R116  1.54K/1%  [R0402]  30.94 3.12 180 top
R117  47.5K  [R0402]  27.6 3.56 270 top
R118  20K/1%  [R0402]  28.97 1.66 0 top
R119  2.2R/1%/0.1W  [R0603]  34.48 5.18 270 top
R120  1.1K/1%  [R0402]  88.07 2.06 180 bottom
R123  NL  [R0402]  9.74 31.71 270 top
R124  NL  [R0402]  6.65 27.35 180 bottom
R125  5.1K/1%  [R0402]  10.63 31.71 90 top
R126  5.1K/1%  [R0402]  4.69 26.6 270 bottom
R127  10K  [R0402]  45.63 50.49 180 bottom
R128  4.7K  [BGA0201]  48.17 47.19 0 bottom
R129  1K  [R0402]  42.19 53.52 90 top
R130  22R/1%  [BGA0201]  48.13 49.54 270 bottom
R131  10K  [R0402]  50.13 52.1 90 bottom
R132  0R  [R0402]  33.32 49.13 180 bottom
R133  10K  [R0402]  50.06 50.37 0 bottom
R134  1K  [BGA0201]  48.66 49.53 90 bottom
R136  100K/5%  [R0402]  36.43 28.2 270 bottom
R137  10K_NL  [R0402]  73.51 7.92 0 top
R138  10K  [R0402]  33.72 32.94 90 top
R139  10K  [R0402]  6.19 44.2 0 bottom
R140  12K/1%  [R0402]  14.74 35.23 180 top
R141  10K  [R0402]  22.74 39.67 90 top
R142  10K  [R0402]  23.76 39.67 90 top
R143  10K  [R0402]  21.65 33.4 270 top
R144  2K/1%  [R0402]  23.05 33.76 180 top
R145  10K  [R0402]  8.11 44.21 180 bottom
R146  10K_NL  [R0402]  7.1 67.05 0 bottom
R147  10K  [R0402]  12.93 70.53 180 bottom
R148  10K  [R0402]  15.85 66.87 270 bottom
R149  10K  [R0402]  85.98 16.29 180 top
R150  10K  [R0402]  97.91 17.12 180 top
R151  499R  [R0402]  85.98 17.18 180 top
R152  499R  [R0402]  97.91 18.01 180 top
R153  499R  [R0402]  100.22 78.29 0 top
R154  499R  [R0402]  100.22 74.48 0 top
R157  499R  [R0402]  100.22 73.21 0 top
R158  499R  [R0402]  100.22 69.4 0 top
R162  10K  [R0402]  12.46 41.35 180 bottom
R169  10K  [R0402]  62.21 75.94 270 bottom
R170  10K  [R0402]  60.77 75.91 270 bottom
R171  10K  [R0402]  37.13 76.41 0 bottom
R172  10K  [R0402]  39.3 76.42 0 bottom
R173  10K_NL  [R0402]  33.31 75.4 0 bottom
R174  10K_NL  [R0402]  35.16 75.39 180 bottom
R175  0R  [R0402]  45.77 38.29 225 bottom
R192  1K  [R0402]  75.39 55.42 0 bottom
R224  0R/0.5W  [R0805_5016]  59.9 44.56 0 top
R237  4.7K  [R0402]  67.75 64.89 180 bottom
R238  4.7K  [R0402]  69.67 63.75 270 bottom
R239  4.7K  [R0402]  72.34 63.75 270 bottom
R240  4.7K  [R0402]  76.23 65.83 90 bottom
R241  4.7K  [R0402]  77.42 63.75 270 bottom
R242  4.7K  [R0402]  79.96 63.75 270 bottom
R243  4.7K  [R0402]  82.5 63.75 270 bottom
R244  4.7K  [R0402]  85.04 63.63 270 bottom
R286  2K  [R0402]  80.73 4.23 90 top
R288  2K  [R0402]  80.77 6.55 0 bottom
R330  10K_NL  [R0402]  67.14 44.04 270 top
R332  10K  [R0402]  72.14 53.98 270 bottom
R354  4.7K  [R0402]  62.67 28.1 90 bottom
R664  402R/1%  [R0402]  28.89 54.87 180 bottom
R668  1.5K/1%  [R0402]  28.89 53.95 0 bottom
R672  2.2R/1%/0.1W  [R0603]  24.46 53.35 180 bottom
R673  10K_NL  [R0402]  25.33 65.65 90 bottom
R674  47.5K  [R0402]  27.97 65.55 90 bottom
R675  20K/1%  [R0402]  27.24 55.75 90 bottom
R676  10K_NL  [R0402]  78.26 59.28 270 bottom
R677  10K_NL  [R0402]  78.13 53.85 270 top
R678  4.7K  [R0402]  79.02 53.85 90 top
R679  4.7K  [R0402]  89.66 65.49 0 top
R681  39R/5%  [R0201]  52.88 17.15 270 bottom
R683  432R  [R0402]  81.72 1.77 270 bottom
R684  432R  [R0402]  84.26 1.77 270 bottom
R685  698R  [R0402]  79.18 1.77 270 bottom
R686  10K_NL  [R0402]  35.15 76.25 0 bottom
R687  10K_NL  [R0402]  33.32 76.26 180 bottom
R688  2K  [R0402]  69 54.64 90 bottom
R689  0R  [R0402]  57.9 51.86 180 bottom
R690  10K_NL  [R0402]  57.49 45.66 90 bottom
R691  1K  [R0402]  47.51 51.2 90 bottom
R694  10K  [R0402]  45.99 49.33 180 bottom
R695  0R  [R0402]  36.77 46.97 90 bottom
R696  2K  [R0402]  98.05 73.23 0 top
R697  2K  [R0402]  98.05 69.36 0 top
R698  2K  [R0402]  98.05 78.31 0 top
R699  2K  [R0402]  98.05 74.44 0 top
R700  499R  [R0402]  100.22 68.13 0 top
R701  499R  [R0402]  100.22 64.32 0 top
R702  499R  [R0402]  100.22 63.05 0 top
R703  499R  [R0402]  100.22 59.24 0 top
R704  2K  [R0402]  98.05 68.15 0 top
R705  2K  [R0402]  98.05 63.07 0 top
R706  2K  [R0402]  98.05 64.28 0 top
R707  2K  [R0402]  98.05 59.2 0 top
SW1  SW_SPST_TS02  [SW_PB_DUAL_FP_PTS647_43018]  101.73 13.06 90 top
SW2  SW_SPST_TS02  [SW_PB_DUAL_FP_PTS647_43018]  89.64 13.06 90 top
SW8  DIP_SW_8  [DIP_SW_8_DUAL_FP_1825_41812]  76.15 67.85 90 top
TP_1P8V  HDR1X1_NL  [HDR_1X1_613]  79.15 20.22 0 top
TP_VDD  HDR1X1_NL  [HDR_1X1_613]  64.09 24.55 0 top
U1  MPFS095T-1FCSG325E  [MPFS025T_095T-FCSG325]  50.13 43.53 0 top
U2  MT40A512M16TB-062E:R  [96BGA_TB_7P5X13MM_MT40A]  50.15 18.4 0 top
U3  TXB0102DCUR  [8-VFSOP_TXB0102_NXB0102]  28.49 41.3 90 top
U4  VSC8221XHH  [100BGA_9X9MM_VSC8221]  68.96 50.33 270 top
U5  AT24CM01-SSHD-B  [8SOIC_DUAL_FP_AT24CM01_M24M01]  65.63 58.98 0 bottom
U6  TXB0108PWR  [TSSOP20_TXB0108_NXB0108_DUAL_FP]  65.13 30.48 0 top
U7  MIC22705YML-TR  [24MLF_MIC22705]  69.45 9.43 180 top
U8  MIC69502WR  [S-PAK-7]  90.51 25.97 90 bottom
U9  MIC22405YML-TR  [20MLF_MIC22405]  89.82 6.44 180 bottom
U10  TPD1S514-1YZR  [WCSP_12]  13.98 7.32 180 top
U11  MIC5166YML-TR  [10MLF_MIC5166]  46.51 4.41 0 top
U12  MIC22405YML-TR  [20MLF_MIC22405]  29.19 6.64 0 top
U14  MBT2222ADW1T1G  [SC706_MBT2222]  98.55 76.38 0 top
U16  FT4232H  [QFP64_0O5MM_12X12_FTDI]  20.5 36.81 0 bottom
U19  MCP121T-315E/TT  [SOT-23B_MCP121T]  31.66 46.78 270 bottom
U29  TXB0102DCUR  [8-VFSOP_TXB0102_NXB0102]  90.41 68.1 270 top
U33  MBT2222ADW1T1G  [SC706_MBT2222]  81.27 4.68 270 bottom
U72  MIC22705YML-TR  [24MLF_MIC22705]  27.11 61.59 270 bottom
U79  TXS0102DCTR  [TXS0102_8-LSSOP]  79.35 57.56 0 top
U82  93LC56BT-I/OT  [SOT23-6]  22.67 36.3 90 top
U83  MBT2222ADW1T1G  [SC706_MBT2222]  98.55 71.3 0 top
U84  MCP1726T-3302E/SN  [8SOIC_MCP1726T]  33.19 30.4 270 bottom
U85  NVT4857UKAZ  [20WLCSP_NVT4857]  36.41 44.8 180 top
U86  MBT2222ADW1T1G  [SC706_MBT2222]  98.55 66.22 0 top
U87  MBT2222ADW1T1G  [SC706_MBT2222]  98.55 61.14 0 top
UNK1P8V  GRN/2.1V/20mA  [LED_0402]  81.72 1.77 90 top
UNK5P0V  GRN/2.1V/20mA  [LED_0402]  79.18 1.77 90 top
VBUS_PWR  -  [TP_SMD_C_40MIL]  16.99 8.98 0 top
VDD  GRN/2.1V/20mA  [LED_0402]  84.26 1.77 90 top
VSC_TDO  TP_SMD_C_40MIL  [TP_SMD_C_30MIL]  69.85 57.02 0 top
X1  125MHz/2.25V-3.63V  [5X3P2M_DUAL_FP_DSC1123B_SIT9120]  32.79 38.36 0 bottom
X2  12MHZ/12pF  [CRY_5X3P2_ECS-120]  10.19 36.69 270 bottom
X3  50MHz/1.8V-3.3V/10ppm  [OSC_2P5X2MM_DUAL_FP_DSC1001D_ECS2520]  61.88 40.74 180 top
Y1  25MHz/20pF  [SMT_XTAL_3P2MMX2P5MM_FL25]  72.46 42.48 180 top

## Library data of the parts
C1-C49 C51 C60-C70 C77 C78 C80-C89 C93-C102 C104 C107-C131 C133-C135 C137 C139-C145 C147 C148 C150 C153-C159 C161 C162 C168-C171 C174-C180 C182 C183 C185-C187 C189 C190 C193 C194 C199-C204 C206 C208 C209 C211-C227 C229 C231 C232 C234 C235 C237-C239 C246-C257 C260-C265 C267-C273 C275 C277 C279-C286 C288 C296 C300 C507 C515 C677-C681 C722-C724 C1090 C1095 C1097 C1103 C1106-C1109 C1112-C1115 C1117-C1120 C1123 C1124 C1126-C1129 C1132 = CAPACITOR NON-POL
C50 C52 C79 C90-C92 C103 C105 C106 = CAP_0603
C74 = CAP_0
C76 = CAP_1812
C152 C160 C172 C241 C1099 = CAPACITOR POL
C165 C166 C173 C240 C242 C243 C297 C1100 C1101 C1104 C1105 C1130 C1131 = CAP
C278 = CAP NP
CLKOUT_125MHZ JT_TCK JT_TDI JT_TDO JT_TMS JT_TRST# VBUS_PWR VSC_TDO = TEST_SMD_C_PAD
D1 D2 = Zener Diodes
D3 = USBLC6-2_0
F2 = FUSE
FB2 FB3 L1 = COIL_1206
GND1 GND4 GND5 TP_1P8V TP_VDD = HEADER 1_2
J3 = 0826-1X1T-GH-F_2
J4 = USB-PD_TYPE-C_3
J5 J6 = 1x8_HDR_0
J7 = PJK_5A_PJ-058AH_0
J10 = 2X20PTS TSM-DV SAMTEC_0
J11 = HEADER 15/SM_1
J12 = HEADER 2X2
J17 = SD_connector_1
J45 J46 J49 = JUMPER_0
J47 = JMP_1X2
J48 = HEADER 5x2/M
L3 L5 L9 L10 = INDUCTOR
L6 L8 = Ferrite_Bead_0
LD1-LD3 UNK1P8V UNK5P0V VDD = LED_1
LED1-LED8 = LED_GRN_0
R1-R35 R42-R51 R54-R56 R58-R71 R73 R78-R86 R88 R90-R98 R100 R101 R104-R109 R111-R113 R115-R120 R123-R134 R136-R154 R157 R158 R162 R169-R175 R192 R224 R237-R244 R286 R288 R330 R332 R354 R664 R668 R672-R679 R681 R683-R691 R694-R707 = R
SW1 SW2 = PB_SWITCH_0
SW8 = DIP_SW_0
U1 = MPFS095T-1FCSG325E
U2 = MT40A512M16TB-062E
U3 U29 = TXB0102DCUR
U4 = VSC8221XHH
U5 = AT24C64D-XHM-B_0
U6 = TXB0106_0
U7 U72 = MIC22705YML-TR
U8 = MIC69502WR
U9 U12 = MIC22405YML-TR
U10 = TPD1S514x
U11 = MIC5166YML-TR
U14 U33 U83 U86 U87 = MMPQ2222A_0
U16 = USB_0: Tolerance: RichardLC; User Part Number: pn
U19 = MCP121T-315E/LB_0
U79 = TXS0102
U82 = 93LC56_SN_2
U84 = MCP1726T-3302E/MF_0
U85 = NVT4857UKAZ
X1 = OSC_PECL_1
X2 = 12MHZ CRYSTAL_0
X3 = ASEMB-50.000MHZ-LC-T
Y1 = XTAL-25M_0

## Footprints (pads in the part's own frame, mm; a bottom-side part is the same pattern mirrored in y, then rotated)
5X3P2M_DUAL_FP_DSC1123B_SIT9120
  rect 1.254x0.9 smd: 1(-1.15,1.27) 2(-1.15,0) 3(-1.15,-1.27) 4(1.15,-1.27) 5(1.15,0) 6(1.15,1.27)
8-VFSOP_TXB0102_NXB0102
  rect 0.8x0.3 smd: 1(-1.55,0.75) 2(-1.55,0.25) 3(-1.55,-0.25) 4(-1.55,-0.75) 5(1.55,-0.75) 6(1.55,-0.25) 7(1.55,0.25) 8(1.55,0.75)
8SOIC_DUAL_FP_AT24CM01_M24M01
  rect 0.764x1.778 smd: 1(-1.905,-2.465) 2(-0.635,-2.465) 3(0.635,-2.465) 4(1.905,-2.465) 5(1.905,2.465) 6(0.635,2.465) 7(-0.635,2.465) 8(-1.905,2.465)
8SOIC_MCP1726T
  rect 1.55x0.6 smd: 1(-2.7,1.905) 2(-2.7,0.635) 3(-2.7,-0.635) 4(-2.7,-1.905) 5(2.7,-1.905) 6(2.7,-0.635) 7(2.7,0.635) 8(2.7,1.905)
10MLF_MIC5166
  rect 0.48x0.26 smd: 1(-1.36,1) 2(-1.36,0.5) 3(-1.36,0) 4(-1.36,-0.5) 5(-1.36,-1) 6(1.36,-1) 7(1.36,-0.5) 8(1.36,0) 9(1.36,0.5) 10(1.36,1)
  rect 1.9x2.6 smd: 11(0,0)
20MLF_MIC22405
  rect 0.25x0.4 smd: 1(-1.25,-1.4) 2(-0.75,-1.4) 3(-0.25,-1.4) 4(0.25,-1.4) 5(0.75,-1.4) 6(1.25,-1.4) 11(1.25,1.4) 12(0.75,1.4) 13(0.25,1.4) 14(-0.25,1.4) 15(-0.75,1.4) 16(-1.25,1.4)
  rect 0.4x0.25 smd: 7(1.9,-0.75) 8(1.9,-0.25) 9(1.9,0.25) 10(1.9,0.75) 17(-1.9,0.75) 18(-1.9,0.25) 19(-1.9,-0.25) 20(-1.9,-0.75)
  rect 2.6x1.6 smd: 21(0,0)
20WLCSP_NVT4857
  round 0.24 smd: A1(-0.6,0.8) A2(-0.2,0.8) A3(0.2,0.8) A4(0.6,0.8) B1(-0.6,0.4) B2(-0.2,0.4) B3(0.2,0.4) B4(0.6,0.4) C1(-0.6,0) C2(-0.2,0) C3(0.2,0) C4(0.6,0) D1(-0.6,-0.4) D2(-0.2,-0.4) D3(0.2,-0.4) D4(0.6,-0.4) E1(-0.6,-0.8) E2(-0.2,-0.8) E3(0.2,-0.8) E4(0.6,-0.8)
24MLF_MIC22705
  rect 0.7x0.3 smd: 1(-1.9,1.25) 2(-1.9,0.75) 3(-1.9,0.25) 4(-1.9,-0.25) 5(-1.9,-0.75) 6(-1.9,-1.25) 13(1.9,-1.25) 14(1.9,-0.75) 15(1.9,-0.25) 16(1.9,0.25) 17(1.9,0.75) 18(1.9,1.25)
  rect 0.3x0.7 smd: 7(-1.25,-1.9) 8(-0.75,-1.9) 9(-0.25,-1.9) 10(0.25,-1.9) 11(0.75,-1.9) 12(1.25,-1.9) 19(1.25,1.9) 20(0.75,1.9) 21(0.25,1.9) 22(-0.25,1.9) 23(-0.75,1.9) 24(-1.25,1.9)
  rect 2.75x2.75 smd: 25(0,0)
96BGA_TB_7P5X13MM_MT40A
  round 0.376 smd: A1(-3.2,6) A2(-2.4,6) A3(-1.6,6) A7(1.6,6) A8(2.4,6) A9(3.2,6) B1(-3.2,5.2) B2(-2.4,5.2) B3(-1.6,5.2) B7(1.6,5.2) B8(2.4,5.2) B9(3.2,5.2) C1(-3.2,4.4) C2(-2.4,4.4) C3(-1.6,4.4) C7(1.6,4.4) C8(2.4,4.4) C9(3.2,4.4) D1(-3.2,3.6) D2(-2.4,3.6) D3(-1.6,3.6) D7(1.6,3.6) D8(2.4,3.6) D9(3.2,3.6) E1(-3.2,2.8) E2(-2.4,2.8) E3(-1.6,2.8) E7(1.6,2.8) E8(2.4,2.8) E9(3.2,2.8) F1(-3.2,2) F2(-2.4,2) F3(-1.6,2) F7(1.6,2) F8(2.4,2) F9(3.2,2) G1(-3.2,1.2) G2(-2.4,1.2) G3(-1.6,1.2) G7(1.6,1.2) G8(2.4,1.2) G9(3.2,1.2) H1(-3.2,0.4) H2(-2.4,0.4) H3(-1.6,0.4) H7(1.6,0.4) H8(2.4,0.4) H9(3.2,0.4) J1(-3.2,-0.4) J2(-2.4,-0.4) J3(-1.6,-0.4) J7(1.6,-0.4) J8(2.4,-0.4) J9(3.2,-0.4) K1(-3.2,-1.2) K2(-2.4,-1.2) K3(-1.6,-1.2) K7(1.6,-1.2) K8(2.4,-1.2) K9(3.2,-1.2) L1(-3.2,-2) L2(-2.4,-2) L3(-1.6,-2) L7(1.6,-2) L8(2.4,-2) L9(3.2,-2) M1(-3.2,-2.8) M2(-2.4,-2.8) M3(-1.6,-2.8) M7(1.6,-2.8) M8(2.4,-2.8) M9(3.2,-2.8) N1(-3.2,-3.6) N2(-2.4,-3.6) N3(-1.6,-3.6) N7(1.6,-3.6) N8(2.4,-3.6) N9(3.2,-3.6) P1(-3.2,-4.4) P2(-2.4,-4.4) P3(-1.6,-4.4) P7(1.6,-4.4) P8(2.4,-4.4) P9(3.2,-4.4) R1(-3.2,-5.2) R2(-2.4,-5.2) R3(-1.6,-5.2) R7(1.6,-5.2) R8(2.4,-5.2) R9(3.2,-5.2) T1(-3.2,-6) T2(-2.4,-6) T3(-1.6,-6) T7(1.6,-6) T8(2.4,-6) T9(3.2,-6)
100BGA_9X9MM_VSC8221
  round 0.28 smd: A1(-3.6,3.6) A2(-2.8,3.6) A3(-2,3.6) A4(-1.2,3.6) A5(-0.4,3.6) A6(0.4,3.6) A7(1.2,3.6) A8(2,3.6) A9(2.8,3.6) A10(3.6,3.6) B1(-3.6,2.8) B2(-2.8,2.8) B3(-2,2.8) B4(-1.2,2.8) B5(-0.4,2.8) B6(0.4,2.8) B7(1.2,2.8) B8(2,2.8) B9(2.8,2.8) B10(3.6,2.8) C1(-3.6,2) C2(-2.8,2) C3(-2,2) C4(-1.2,2) C5(-0.4,2) C6(0.4,2) C7(1.2,2) C8(2,2) C9(2.8,2) C10(3.6,2) D1(-3.6,1.2) D2(-2.8,1.2) D3(-2,1.2) D4(-1.2,1.2) D5(-0.4,1.2) D6(0.4,1.2) D7(1.2,1.2) D8(2,1.2) D9(2.8,1.2) D10(3.6,1.2) E1(-3.6,0.4) E2(-2.8,0.4) E3(-2,0.4) E4(-1.2,0.4) E5(-0.4,0.4) E6(0.4,0.4) E7(1.2,0.4) E8(2,0.4) E9(2.8,0.4) E10(3.6,0.4) F1(-3.6,-0.4) F2(-2.8,-0.4) F3(-2,-0.4) F4(-1.2,-0.4) F5(-0.4,-0.4) F6(0.4,-0.4) F7(1.2,-0.4) F8(2,-0.4) F9(2.8,-0.4) F10(3.6,-0.4) G1(-3.6,-1.2) G2(-2.8,-1.2) G3(-2,-1.2) G4(-1.2,-1.2) G5(-0.4,-1.2) G6(0.4,-1.2) G7(1.2,-1.2) G8(2,-1.2) G9(2.8,-1.2) G10(3.6,-1.2) H1(-3.6,-2) H2(-2.8,-2) H3(-2,-2) H4(-1.2,-2) H5(-0.4,-2) H6(0.4,-2) H7(1.2,-2) H8(2,-2) H9(2.8,-2) H10(3.6,-2) J1(-3.6,-2.8) J2(-2.8,-2.8) J3(-2,-2.8) J4(-1.2,-2.8) J5(-0.4,-2.8) J6(0.4,-2.8) J7(1.2,-2.8) J8(2,-2.8) J9(2.8,-2.8) J10(3.6,-2.8) K1(-3.6,-3.6) K2(-2.8,-3.6) K3(-2,-3.6) K4(-1.2,-3.6) K5(-0.4,-3.6) K6(0.4,-3.6) K7(1.2,-3.6) K8(2,-3.6) K9(2.8,-3.6) K10(3.6,-3.6)
BEL_RJ45_MAG_SI-61001-F
  round 3.758 hole 3.25 unplated: (-5.715,10.79) (5.715,10.79)
  rect 1.398x1.398 hole 0.89: 1(-5.715,19.68)
  round 1.398 hole 0.89: 2(-4.445,17.14) 3(-3.175,19.68) 4(-1.905,17.14) 5(-0.635,19.68) 6(0.635,17.14) 7(1.905,19.68) 8(3.175,17.14) 9(4.445,19.68) 10(5.715,17.14)
  round 2.078 hole 1.57: 21(-7.745,13.84) 22(7.745,13.84)
  round 1.528 hole 1.02: GA(-6.625,6.73) GC(-4.085,6.73) YA(4.085,6.73) YC(6.625,6.73)
BGA0201
  rect 0.305x0.381 smd: 1(-0.267,0) 2(0.267,0)
BGA0402
  custom 0.635x0.635 smd: 1(-0.5,0) 2(0.5,0)
C0201
  rect 0.35x0.48 smd: 1(-0.275,0) 2(0.275,0)
C0201_HS
  rect 0.305x0.381 smd: 1(-0.267,0) 2(0.267,0)
C0402
  rect 0.635x0.635 smd: 1(-0.5,0) 2(0.5,0)
C0603
  rect 1.092x1.016 smd: 1(-0.787,0) 2(0.787,0)
C0805
  rect 1.524x1.524 smd: 1(-1.062,0) 2(1.062,0)
C1206
  rect 1.8x1.8 smd: 1(-1.4,0) 2(1.4,0)
C1210
  rect 1.16x2.72 smd: 1(-1.475,0) 2(1.475,0)
C1812
  rect 1.6x3.6 smd: 1(-2.15,0) 2(2.15,0)
CAP_AL_D_8P3MM_DUAL_FP_16SEV_865
  rect 4.2x1.9 smd: 1(-3.5,0) 2(3.5,0)
CONN_FPC_15POS_1MM_TRIP_FP_686115183_1489
  rect 0.6x2 smd: 1(-7,6.25) 2(-6,6.25) 3(-5,6.25) 4(-4,6.25) 5(-3,6.25) 6(-2,6.25) 7(-1,6.25) 8(0,6.25) 9(1,6.25) 10(2,6.25) 11(3,6.25) 12(4,6.25) 13(5,6.25) 14(6,6.25) 15(7,6.25)
  custom 2.95x4.2 smd: SH1(-9.125,4.15) SH2(9.125,4.15)
CRY_5X3P2_ECS-120
  rect 1.9x2.4 smd: 1(-2.05,0) 2(2.05,0)
DIP_SW_8_DUAL_FP_1825_41812
  rect 2.45x1.52 smd: 1(-4.275,8.89) 1A(4.275,8.89) 2(-4.275,6.35) 2A(4.275,6.35) 3(-4.275,3.81) 3A(4.275,3.81) 4(-4.275,1.27) 4A(4.275,1.27) 5(-4.275,-1.27) 5A(4.275,-1.27) 6(-4.275,-3.81) 6A(4.275,-3.81) 7(-4.275,-6.35) 7A(4.275,-6.35) 8(-4.275,-8.89) 8A(4.275,-8.89)
HDR_1X1_613
  rect 1.524x1.524 hole 1.016: 1(0,0)
HDR_1X2_100MIL_TSW
  rect 1.524x1.524 hole 1.016: 1(0,0)
  round 1.524 hole 1.016: 2(2.54,0)
HDR_2X2_100MIL_61300
  rect 1.608x1.608 hole 1.1: 1(-1.27,-1.27)
  round 1.608 hole 1.1: 2(-1.27,1.27) 3(1.27,-1.27) 4(1.27,1.27)
HDR_3X1_100MIL_613
  round 1.6 hole 1.1: 1(0,2.54) 2(0,0) 3(0,-2.54)
HDR_5X2_RA_100MIL_DUAL_FP_PH2_613
  rect 1.524x1.524 hole 1.016: 1(5.08,13.08)
  round 1.524 hole 1.016: 2(5.08,10.54) 3(2.54,13.08) 4(2.54,10.54) 5(0,13.08) 6(0,10.54) 7(-2.54,13.08) 8(-2.54,10.54) 9(-5.08,13.08) 10(-5.08,10.54)
HDR_20X2_100MIL_61304
  round 6.2 hole 2.75 unplated: (-29,0) (29,0)
  rect 1.608x1.608 hole 1.1: 1(24.13,1.27)
  round 1.608 hole 1.1: 2(24.13,-1.27) 3(21.59,1.27) 4(21.59,-1.27) 5(19.05,1.27) 6(19.05,-1.27) 7(16.51,1.27) 8(16.51,-1.27) 9(13.97,1.27) 10(13.97,-1.27) 11(11.43,1.27) 12(11.43,-1.27) 13(8.89,1.27) 14(8.89,-1.27) 15(6.35,1.27) 16(6.35,-1.27) 17(3.81,1.27) 18(3.81,-1.27) 19(1.27,1.27) 20(1.27,-1.27) 21(-1.27,1.27) 22(-1.27,-1.27) 23(-3.81,1.27) 24(-3.81,-1.27) 25(-6.35,1.27) 26(-6.35,-1.27) 27(-8.89,1.27) 28(-8.89,-1.27) 29(-11.43,1.27) 30(-11.43,-1.27) 31(-13.97,1.27) 32(-13.97,-1.27) 33(-16.51,1.27) 34(-16.51,-1.27) 35(-19.05,1.27) 36(-19.05,-1.27) 37(-21.59,1.27) 38(-21.59,-1.27) 39(-24.13,1.27) 40(-24.13,-1.27)
IND_4X4MM_DUAL_FP_ASPI_7440
  rect 1.5x3.6 smd: 1(-1.525,0) 2(1.525,0)
IND_TRIP_FP_HCP0704_SPM6530_744939
  rect 2.774x5.5 smd: 1(2.55,0) 2(-2.55,0)
IND_TRIP_FP_SPM6530_FP3_744939
  rect 5.5x2.7 smd: 1(0,2.6) 2(0,-2.6)
L0805
  rect 1.3x1.5 smd: 1(-0.95,0) 2(0.95,0)
L1206
  rect 1.27x2.032 smd: 1(-1.325,0) 2(1.325,0)
LED_0402
  rect 0.7x0.5 smd: A(0.45,0) K(-0.45,0)
LED_0603
  rect 0.8x1.1 smd: A(-0.75,0) K(0.75,0)
MPFS025T_095T-FCSG325
  round 0.24 smd: A1(-5,5) A2(-4.5,5) A3(-4,5) A4(-3.5,5) A5(-3,5) A6(-2.5,5) A7(-2,5) A8(-1.5,5) A9(-1,5) A10(-0.5,5) A11(0,5) A12(0.5,5) A13(1,5) A14(1.5,5) A15(2,5) A16(2.5,5) A17(3,5) A18(3.5,5) A19(4,5) A20(4.5,5) A21(5,5) AA1(-5,-5) AA2(-4.5,-5) AA3(-4,-5) AA4(-3.5,-5) AA5(-3,-5) AA6(-2.5,-5) AA7(-2,-5) AA8(-1.5,-5) AA9(-1,-5) AA10(-0.5,-5) AA11(0,-5) AA12(0.5,-5) AA13(1,-5) AA14(1.5,-5) AA15(2,-5) AA16(2.5,-5) AA17(3,-5) AA18(3.5,-5) AA19(4,-5) AA20(4.5,-5) AA21(5,-5) B1(-5,4.5) B2(-4.5,4.5) B3(-4,4.5) B4(-3.5,4.5) B5(-3,4.5) B6(-2.5,4.5) B7(-2,4.5) B8(-1.5,4.5) B9(-1,4.5) B10(-0.5,4.5) B11(0,4.5) B12(0.5,4.5) B13(1,4.5) B14(1.5,4.5) B15(2,4.5) B16(2.5,4.5) B17(3,4.5) B18(3.5,4.5) B19(4,4.5) B20(4.5,4.5) B21(5,4.5) C1(-5,4) C2(-4.5,4) C6(-2.5,4) C11(0,4) C16(2.5,4) C20(4.5,4) C21(5,4) D1(-5,3.5) D2(-4.5,3.5) D4(-3.5,3.5) D5(-3,3.5) D6(-2.5,3.5) D7(-2,3.5) D8(-1.5,3.5) D9(-1,3.5) D10(-0.5,3.5) D11(0,3.5) D12(0.5,3.5) D13(1,3.5) D14(1.5,3.5) D15(2,3.5) D16(2.5,3.5) D17(3,3.5) D18(3.5,3.5) D20(4.5,3.5) D21(5,3.5) E1(-5,3) E2(-4.5,3) E4(-3.5,3) E5(-3,3) E6(-2.5,3) E7(-2,3) E8(-1.5,3) E9(-1,3) E10(-0.5,3) E11(0,3) E12(0.5,3) E13(1,3) E14(1.5,3) E15(2,3) E16(2.5,3) E17(3,3) E18(3.5,3) E20(4.5,3) E21(5,3) F1(-5,2.5) F2(-4.5,2.5) F3(-4,2.5) F4(-3.5,2.5) F5(-3,2.5) F17(3,2.5) F18(3.5,2.5) F19(4,2.5) F20(4.5,2.5) F21(5,2.5) G1(-5,2) G2(-4.5,2) G4(-3.5,2) G5(-3,2) G7(-2,2) G8(-1.5,2) G9(-1,2) G10(-0.5,2) G11(0,2) G12(0.5,2) G13(1,2) G14(1.5,2) G15(2,2) G17(3,2) G18(3.5,2) G20(4.5,2) G21(5,2) H1(-5,1.5) H2(-4.5,1.5) H4(-3.5,1.5) H5(-3,1.5) H7(-2,1.5) H15(2,1.5) H17(3,1.5) H18(3.5,1.5) H20(4.5,1.5) H21(5,1.5) J1(-5,1) J2(-4.5,1) J4(-3.5,1) J5(-3,1) J7(-2,1) J9(-1,1) J10(-0.5,1) J11(0,1) J12(0.5,1) J13(1,1) J15(2,1) J17(3,1) J18(3.5,1) J20(4.5,1) J21(5,1) K1(-5,0.5) K2(-4.5,0.5) K4(-3.5,0.5) K5(-3,0.5) K7(-2,0.5) K9(-1,0.5) K10(-0.5,0.5) K11(0,0.5) K12(0.5,0.5) K13(1,0.5) K15(2,0.5) K17(3,0.5) K18(3.5,0.5) K20(4.5,0.5) K21(5,0.5) L1(-5,0) L2(-4.5,0) L3(-4,0) L4(-3.5,0) L5(-3,0) L7(-2,0) L9(-1,0) L10(-0.5,0) L11(0,0) L12(0.5,0) L13(1,0) L15(2,0) L17(3,0) L18(3.5,0) L19(4,0) L20(4.5,0) L21(5,0) M1(-5,-0.5) M2(-4.5,-0.5) M4(-3.5,-0.5) M5(-3,-0.5) M7(-2,-0.5) M9(-1,-0.5) M10(-0.5,-0.5) M11(0,-0.5) M12(0.5,-0.5) M13(1,-0.5) M15(2,-0.5) M17(3,-0.5) M18(3.5,-0.5) M20(4.5,-0.5) M21(5,-0.5) N1(-5,-1) N2(-4.5,-1) N4(-3.5,-1) N5(-3,-1) N7(-2,-1) N9(-1,-1) N10(-0.5,-1) N11(0,-1) N12(0.5,-1) N13(1,-1) N15(2,-1) N17(3,-1) N18(3.5,-1) N20(4.5,-1) N21(5,-1) P1(-5,-1.5) P2(-4.5,-1.5) P4(-3.5,-1.5) P5(-3,-1.5) P7(-2,-1.5) P15(2,-1.5) P17(3,-1.5) P18(3.5,-1.5) P20(4.5,-1.5) P21(5,-1.5) R1(-5,-2) R2(-4.5,-2) R4(-3.5,-2) R5(-3,-2) R7(-2,-2) R8(-1.5,-2) R9(-1,-2) R10(-0.5,-2) R11(0,-2) R12(0.5,-2) R13(1,-2) R14(1.5,-2) R15(2,-2) R17(3,-2) R18(3.5,-2) R20(4.5,-2) R21(5,-2) T1(-5,-2.5) T2(-4.5,-2.5) T3(-4,-2.5) T4(-3.5,-2.5) T5(-3,-2.5) T17(3,-2.5) T18(3.5,-2.5) T19(4,-2.5) T20(4.5,-2.5) T21(5,-2.5) U1(-5,-3) U2(-4.5,-3) U4(-3.5,-3) U5(-3,-3) U6(-2.5,-3) U7(-2,-3) U8(-1.5,-3) U9(-1,-3) U10(-0.5,-3) U11(0,-3) U12(0.5,-3) U13(1,-3) U14(1.5,-3) U15(2,-3) U16(2.5,-3) U17(3,-3) U18(3.5,-3) U20(4.5,-3) U21(5,-3) V1(-5,-3.5) V2(-4.5,-3.5) V4(-3.5,-3.5) V5(-3,-3.5) V6(-2.5,-3.5) V7(-2,-3.5) V8(-1.5,-3.5) V9(-1,-3.5) V10(-0.5,-3.5) V11(0,-3.5) V12(0.5,-3.5) V13(1,-3.5) V14(1.5,-3.5) V15(2,-3.5) V16(2.5,-3.5) V17(3,-3.5) V18(3.5,-3.5) V20(4.5,-3.5) V21(5,-3.5) W1(-5,-4) W2(-4.5,-4) W6(-2.5,-4) W11(0,-4) W16(2.5,-4) W20(4.5,-4) W21(5,-4) Y1(-5,-4.5) Y2(-4.5,-4.5) Y3(-4,-4.5) Y4(-3.5,-4.5) Y5(-3,-4.5) Y6(-2.5,-4.5) Y7(-2,-4.5) Y8(-1.5,-4.5) Y9(-1,-4.5) Y10(-0.5,-4.5) Y11(0,-4.5) Y12(0.5,-4.5) Y13(1,-4.5) Y14(1.5,-4.5) Y15(2,-4.5) Y16(2.5,-4.5) Y17(3,-4.5) Y18(3.5,-4.5) Y19(4,-4.5) Y20(4.5,-4.5) Y21(5,-4.5)
OSC_2P5X2MM_DUAL_FP_DSC1001D_ECS2520
  rect 0.9x0.9 smd: 1(-0.75,0.825) 2(-0.75,-0.825) 3(0.75,-0.825) 4(0.75,0.825)
PGB1010603MR
  rect 0.813x1.27 smd: 1(0,0.891) 2(0,-0.891)
PJK_5A_PJ-047AH
  round 2.4 hole 2.4 unplated: (-4,0)
  oval 2.508x1.508 hole 2x1: 1(-10.3,3.3) 3(-10.3,-3.3)
  oval 1.508x2.508 hole 1x2: 2(-8,0)
  oval 2.808x1.508 hole 2.3x1: SH1(-3,3.65) SH2(-3,-3.65)
QFP64_0O5MM_12X12_FTDI
  oval 1.65x0.3 smd: 1(-5.775,3.75) 2(-5.775,3.25) 3(-5.775,2.75) 4(-5.775,2.25) 5(-5.775,1.75) 6(-5.775,1.25) 7(-5.775,0.75) 8(-5.775,0.25) 9(-5.775,-0.25) 10(-5.775,-0.75) 11(-5.775,-1.25) 12(-5.775,-1.75) 13(-5.775,-2.25) 14(-5.775,-2.75) 15(-5.775,-3.25) 16(-5.775,-3.75) 33(5.775,-3.75) 34(5.775,-3.25) 35(5.775,-2.75) 36(5.775,-2.25) 37(5.775,-1.75) 38(5.775,-1.25) 39(5.775,-0.75) 40(5.775,-0.25) 41(5.775,0.25) 42(5.775,0.75) 43(5.775,1.25) 44(5.775,1.75) 45(5.775,2.25) 46(5.775,2.75) 47(5.775,3.25) 48(5.775,3.75)
  oval 0.3x1.65 smd: 17(-3.75,-5.775) 18(-3.25,-5.775) 19(-2.75,-5.775) 20(-2.25,-5.775) 21(-1.75,-5.775) 22(-1.25,-5.775) 23(-0.75,-5.775) 24(-0.25,-5.775) 25(0.25,-5.775) 26(0.75,-5.775) 27(1.25,-5.775) 28(1.75,-5.775) 29(2.25,-5.775) 30(2.75,-5.775) 31(3.25,-5.775) 32(3.75,-5.775) 49(3.75,5.775) 50(3.25,5.775) 51(2.75,5.775) 52(2.25,5.775) 53(1.75,5.775) 54(1.25,5.775) 55(0.75,5.775) 56(0.25,5.775) 57(-0.25,5.775) 58(-0.75,5.775) 59(-1.25,5.775) 60(-1.75,5.775) 61(-2.25,5.775) 62(-2.75,5.775) 63(-3.25,5.775) 64(-3.75,5.775)
R0201
  rect 0.35x0.48 smd: 1(-0.275,0) 2(0.275,0)
R0402
  rect 0.635x0.635 smd: 1(-0.5,0) 2(0.5,0)
R0603
  rect 1.092x1.016 smd: 1(-0.787,0) 2(0.787,0)
R0805_5016
  rect 1.015x1.4 smd: 1(-0.878,0) 2(0.878,0)
RCP_1X8_100MIL_DUAL_FP_PPTC08_61300
  rect 1.528x1.528 hole 1.02: 1(-8.89,0)
  round 1.528 hole 1.02: 2(-6.35,0) 3(-3.81,0) 4(-1.27,0) 5(1.27,0) 6(3.81,0) 7(6.35,0) 8(8.89,0)
S-PAK-7
  rect 0.889x2.032 smd: 1(-3.81,-5.652) 2(-2.54,-5.652) 3(-1.27,-5.652) 4(0,-5.652) 5(1.27,-5.652) 6(2.54,-5.652) 7(3.81,-5.652)
  rect 9.144x8.636 smd: 8(0,0.572)
SC706_MBT2222
  rect 0.3x0.66 smd: 1(-0.65,-0.92) 2(0,-0.92) 3(0.65,-0.92) 4(0.65,0.92) 5(0,0.92) 6(-0.65,0.92)
SM_R_1812_1812L300
  rect 1.78x3.15 smd: 1(-2.615,0) 2(2.615,0)
SMT_XTAL_3P2MMX2P5MM_FL25
  rect 1.5x1.2 smd: 1(-1.05,-0.8) 2(1.05,-0.8) 3(1.05,0.8) 4(-1.05,0.8)
SOT23-6
  rect 1.1x0.6 smd: 1(-1.295,0.965) 2(-1.295,0) 3(-1.295,-0.965) 4(1.295,-0.965) 5(1.295,0) 6(1.295,0.965)
SOT23-6_DUAL_FP_USBLC6_SRL05
  rect 1.2x0.6 smd: 1(-1.15,0.95) 2(-1.15,0) 3(-1.15,-0.95) 4(1.15,-0.95) 5(1.15,0) 6(1.15,0.95)
SOT-23B_MCP121T
  rect 0.65x1.05 smd: 1(-0.95,-1.15) 2(0.95,-1.15) 3(0,1.15)
SW_PB_DUAL_FP_PTS647_43018
  rect 2.65x1.4 smd: 1(-3.175,1.5) 2(3.175,1.5) 3(-3.175,-1.5) 4(3.175,-1.5)
TAN_D_TPSD
  rect 1.808x2.654 smd: 1(-3,0) 2(3,0)
TP_SMD_C_30MIL
  round 0.762 smd: 1(0,0)
TP_SMD_C_40MIL
  round 1.016 smd: 1(0,0)
TSSOP20_TXB0108_NXB0108_DUAL_FP
  rect 1.5x0.45 smd: 1(-2.9,2.925) 2(-2.9,2.275) 3(-2.9,1.625) 4(-2.9,0.975) 5(-2.9,0.325) 6(-2.9,-0.325) 7(-2.9,-0.975) 8(-2.9,-1.625) 9(-2.9,-2.275) 10(-2.9,-2.925) 11(2.9,-2.925) 12(2.9,-2.275) 13(2.9,-1.625) 14(2.9,-0.975) 15(2.9,-0.325) 16(2.9,0.325) 17(2.9,0.975) 18(2.9,1.625) 19(2.9,2.275) 20(2.9,2.925)
TXS0102_8-LSSOP
  rect 0.3x1.6 smd: 1(0.975,1.7) 2(0.325,1.7) 3(-0.325,1.7) 4(-0.975,1.7) 5(-0.975,-1.7) 6(-0.325,-1.7) 7(0.325,-1.7) 8(0.975,-1.7)
unnamed#2
  round 1.016 smd: (0,0)
unnamed#3
  round 6.35 hole 3.175 unplated: (0,0)
USB_C_RCP_DUAL_FP_USB4105_629722
  round 0.65 hole 0.65 unplated: (-2.89,6.28) (2.89,6.28)
  rect 0.6x1.15 smd: A1B12(-3.2,7.355) A4B9(-2.4,7.355) B1A12(3.2,7.355) B4A9(2.4,7.355)
  rect 0.3x1.15 smd: A5(-1.25,7.355) A6(-0.25,7.355) A7(0.25,7.355) A8(1.25,7.355) B5(1.75,7.355) B6(0.75,7.355) B7(-0.75,7.355) B8(-1.75,7.355)
  oval 1x2.1 hole 0.6x1.7: SH1(-4.32,6.78) SH2(4.32,6.78)
  oval 1x1.8 hole 0.6x1.4: SH3(4.32,2.6) SH4(-4.32,2.6)
USD_CONN_MEM2075
  round 0.95 hole 0.95 unplated: (-3.875,3.98) (2.925,3.98)
  rect 0.62x1.4 smd: 1(2.105,15.4) 2(1.005,15.4) 3(-0.095,15.4) 4(-1.195,15.4) 5(-2.295,15.4) 6(-3.395,15.4) 7(-4.495,15.4) 8(-5.595,15.4) 9(-6.695,15.4)
  rect 1.1x2.4 smd: S1(-8.075,4.4) S2(-8.075,13.4) S3(8.075,13.4) S4(8.075,4.4)
WCSP_12
  round 0.24 smd: A1(-0.6,0.4) A2(-0.2,0.4) A3(0.2,0.4) A4(0.6,0.4) B1(-0.6,0) B2(-0.2,0) B3(0.2,0) B4(0.6,0) C1(-0.6,-0.4) C2(-0.2,-0.4) C3(0.2,-0.4) C4(0.6,-0.4)

## Nets
